# Altium PCB fligt_control_card.PcbDoc (part 1 of 3)
Units mil, origin at the board's own origin, x right, y up, seen from the top; angles counter-clockwise.
Board outline 2510.03 x 2930.03 mil, 4 copper layers (Top Layer, LY_1, LY_2, Bottom Layer), stack 62.677 mil thick; 107 components, 79 nets, 361 pads, 454 vias.
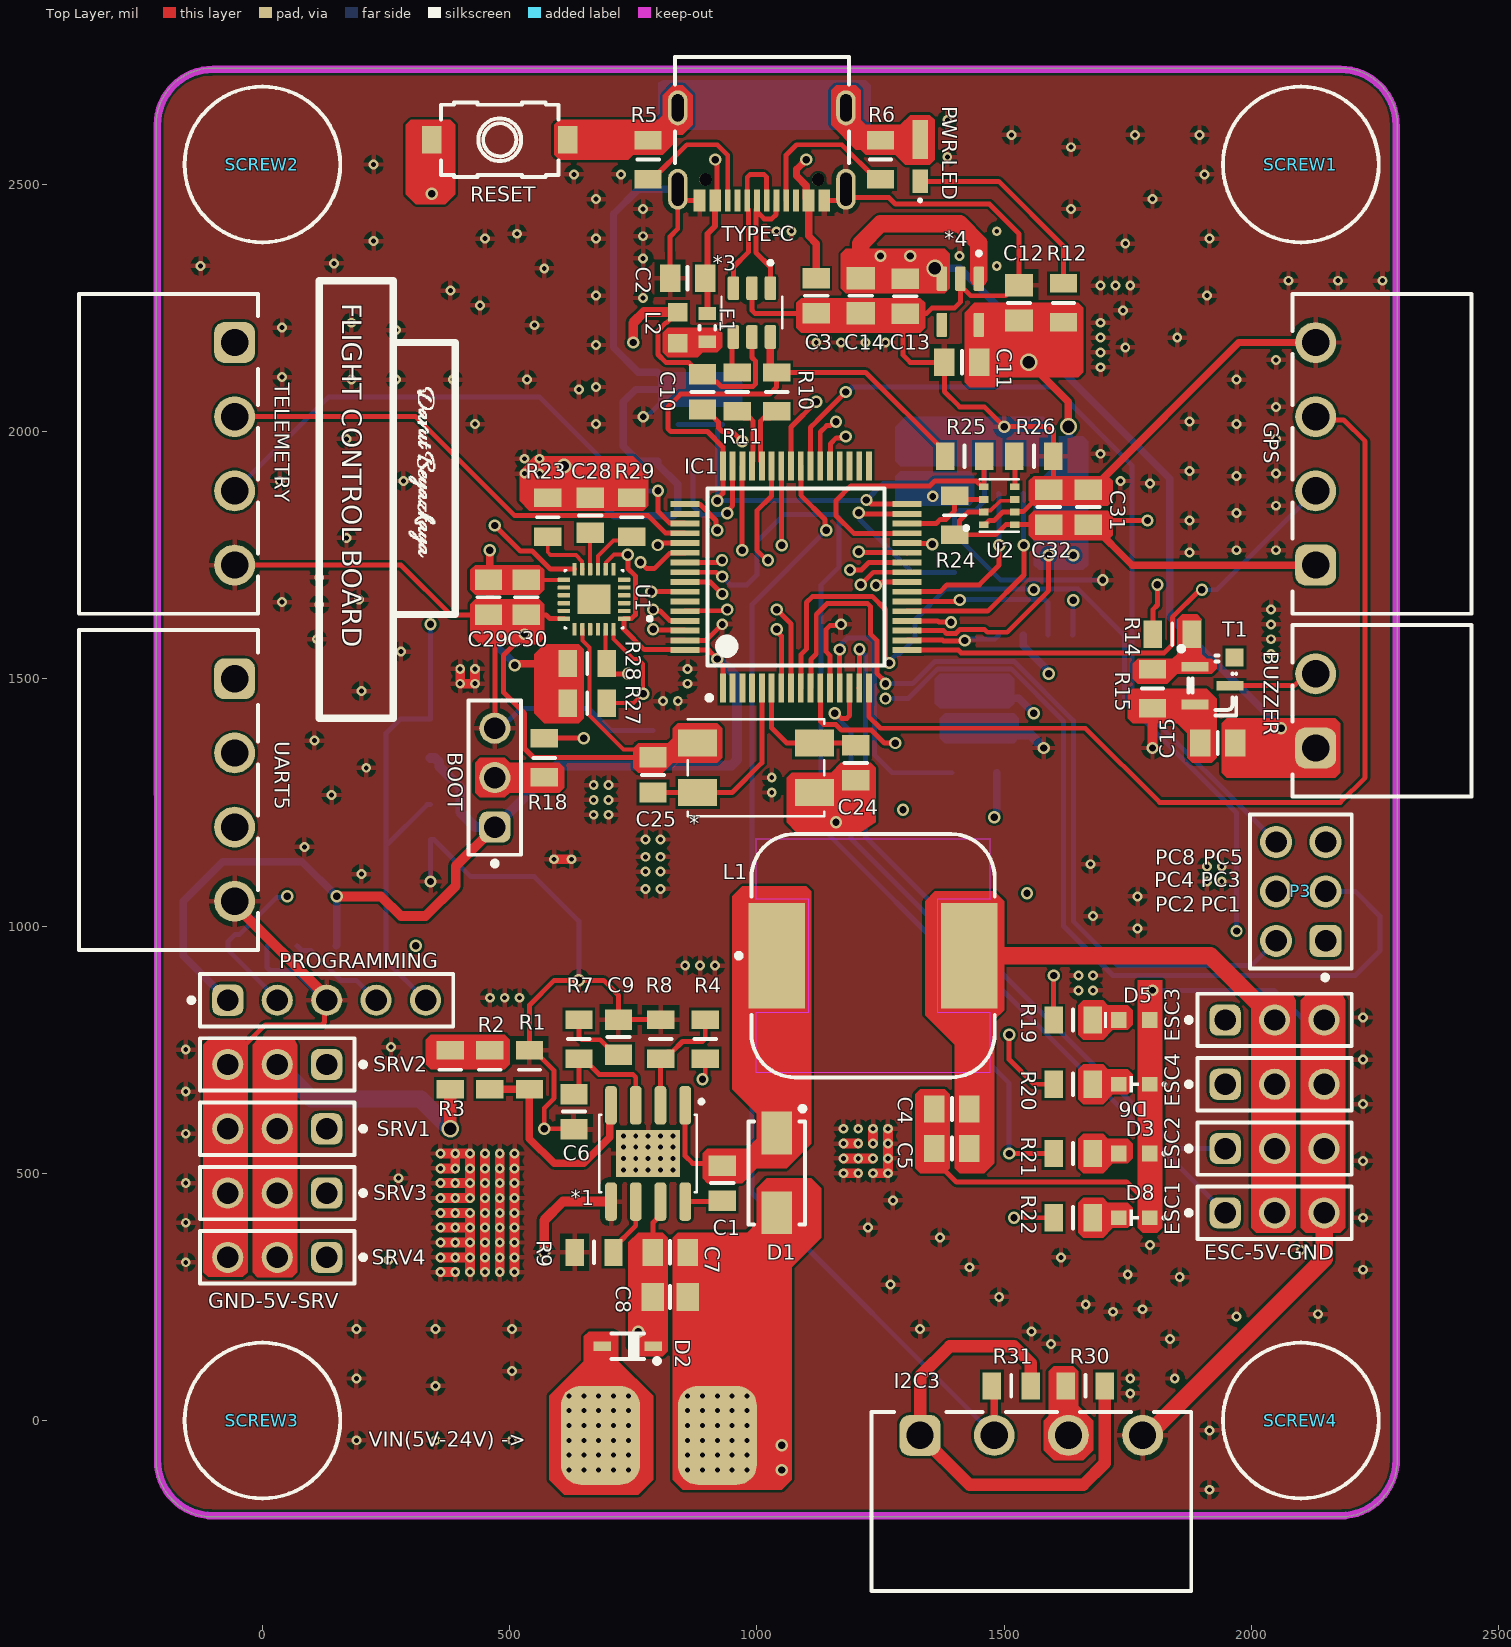
[diagram p0: Top Layer view]
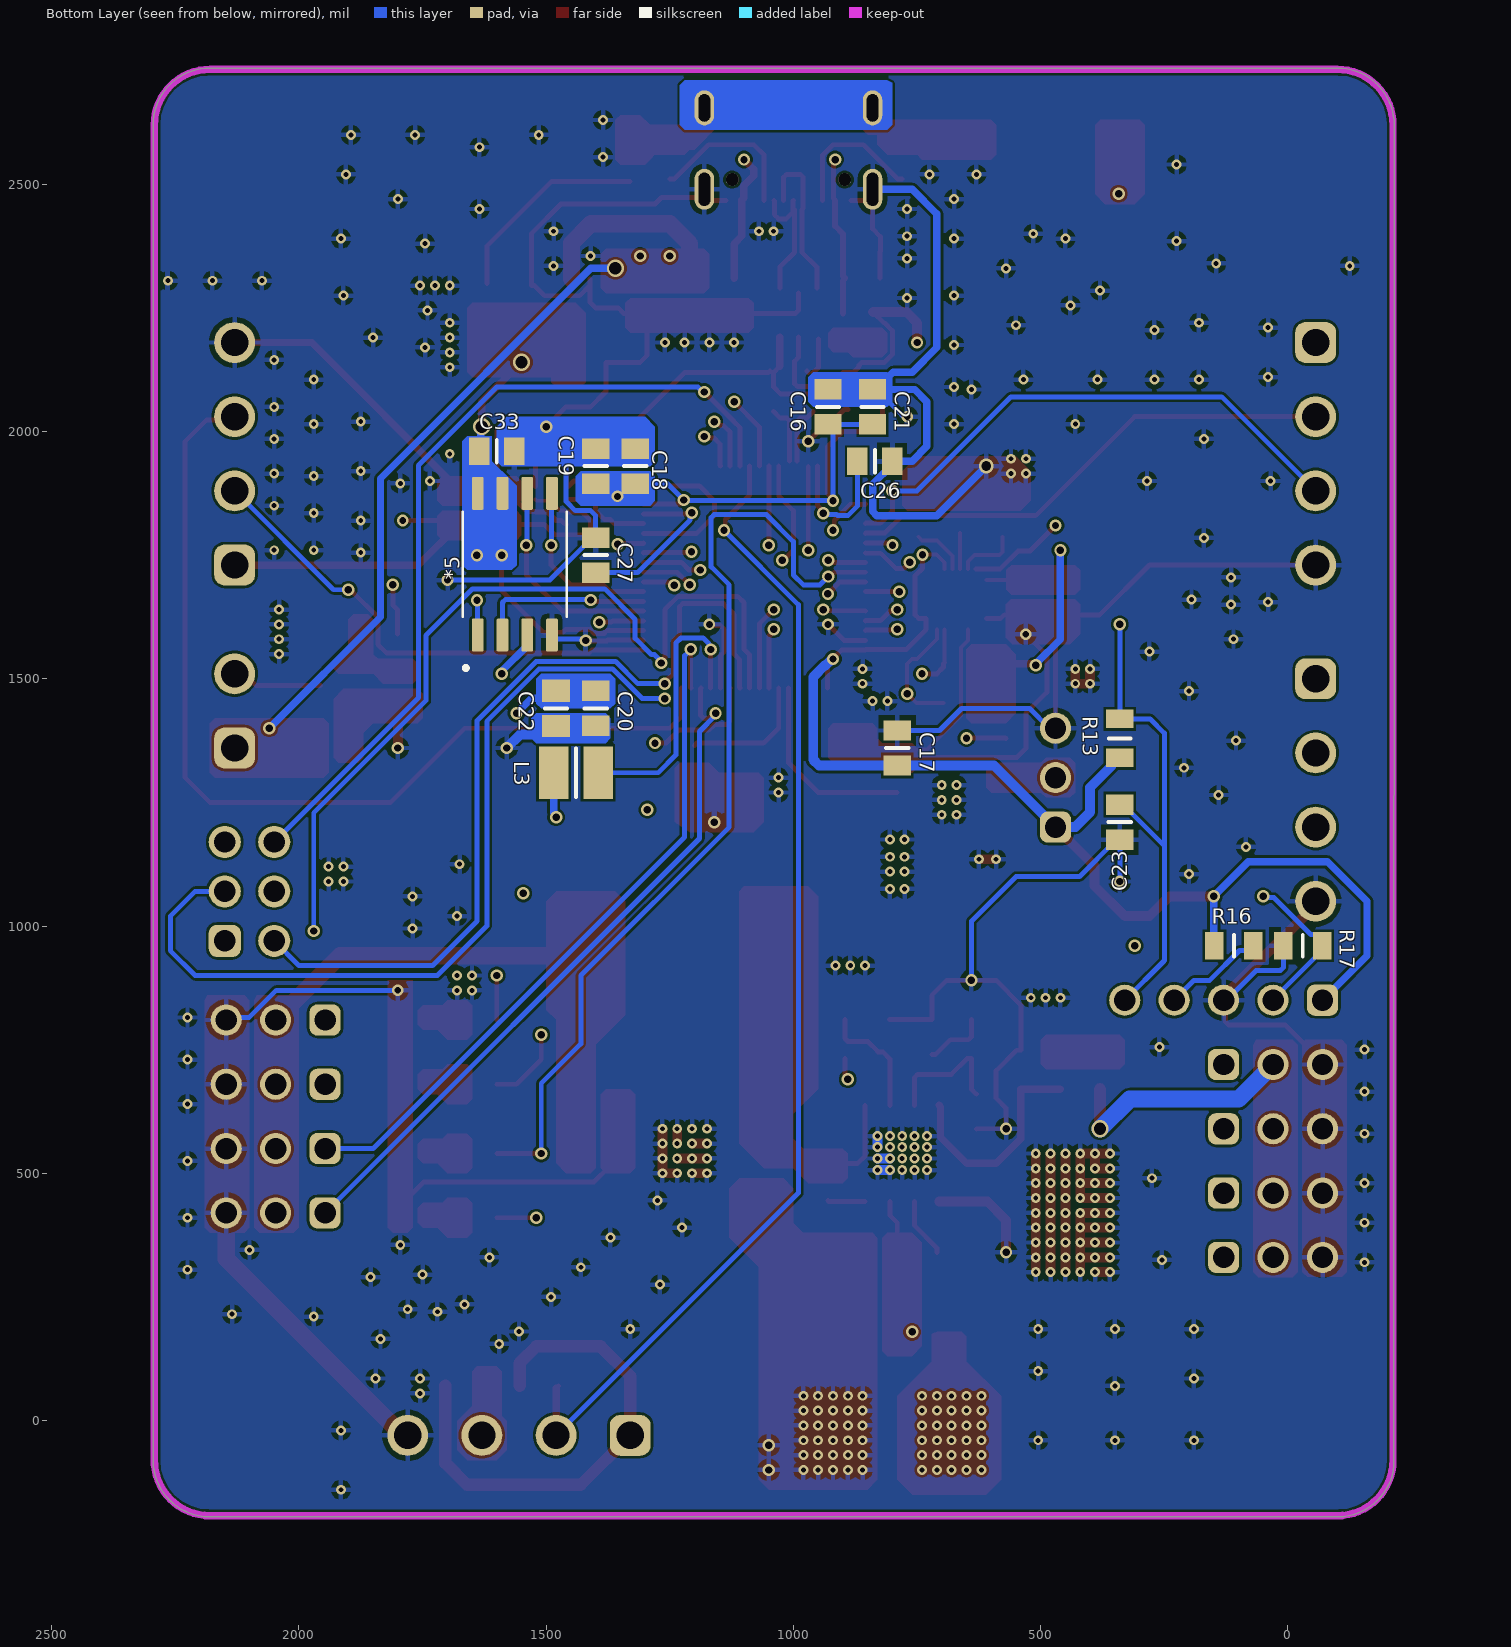
[diagram p1: Bottom Layer view, seen from below]
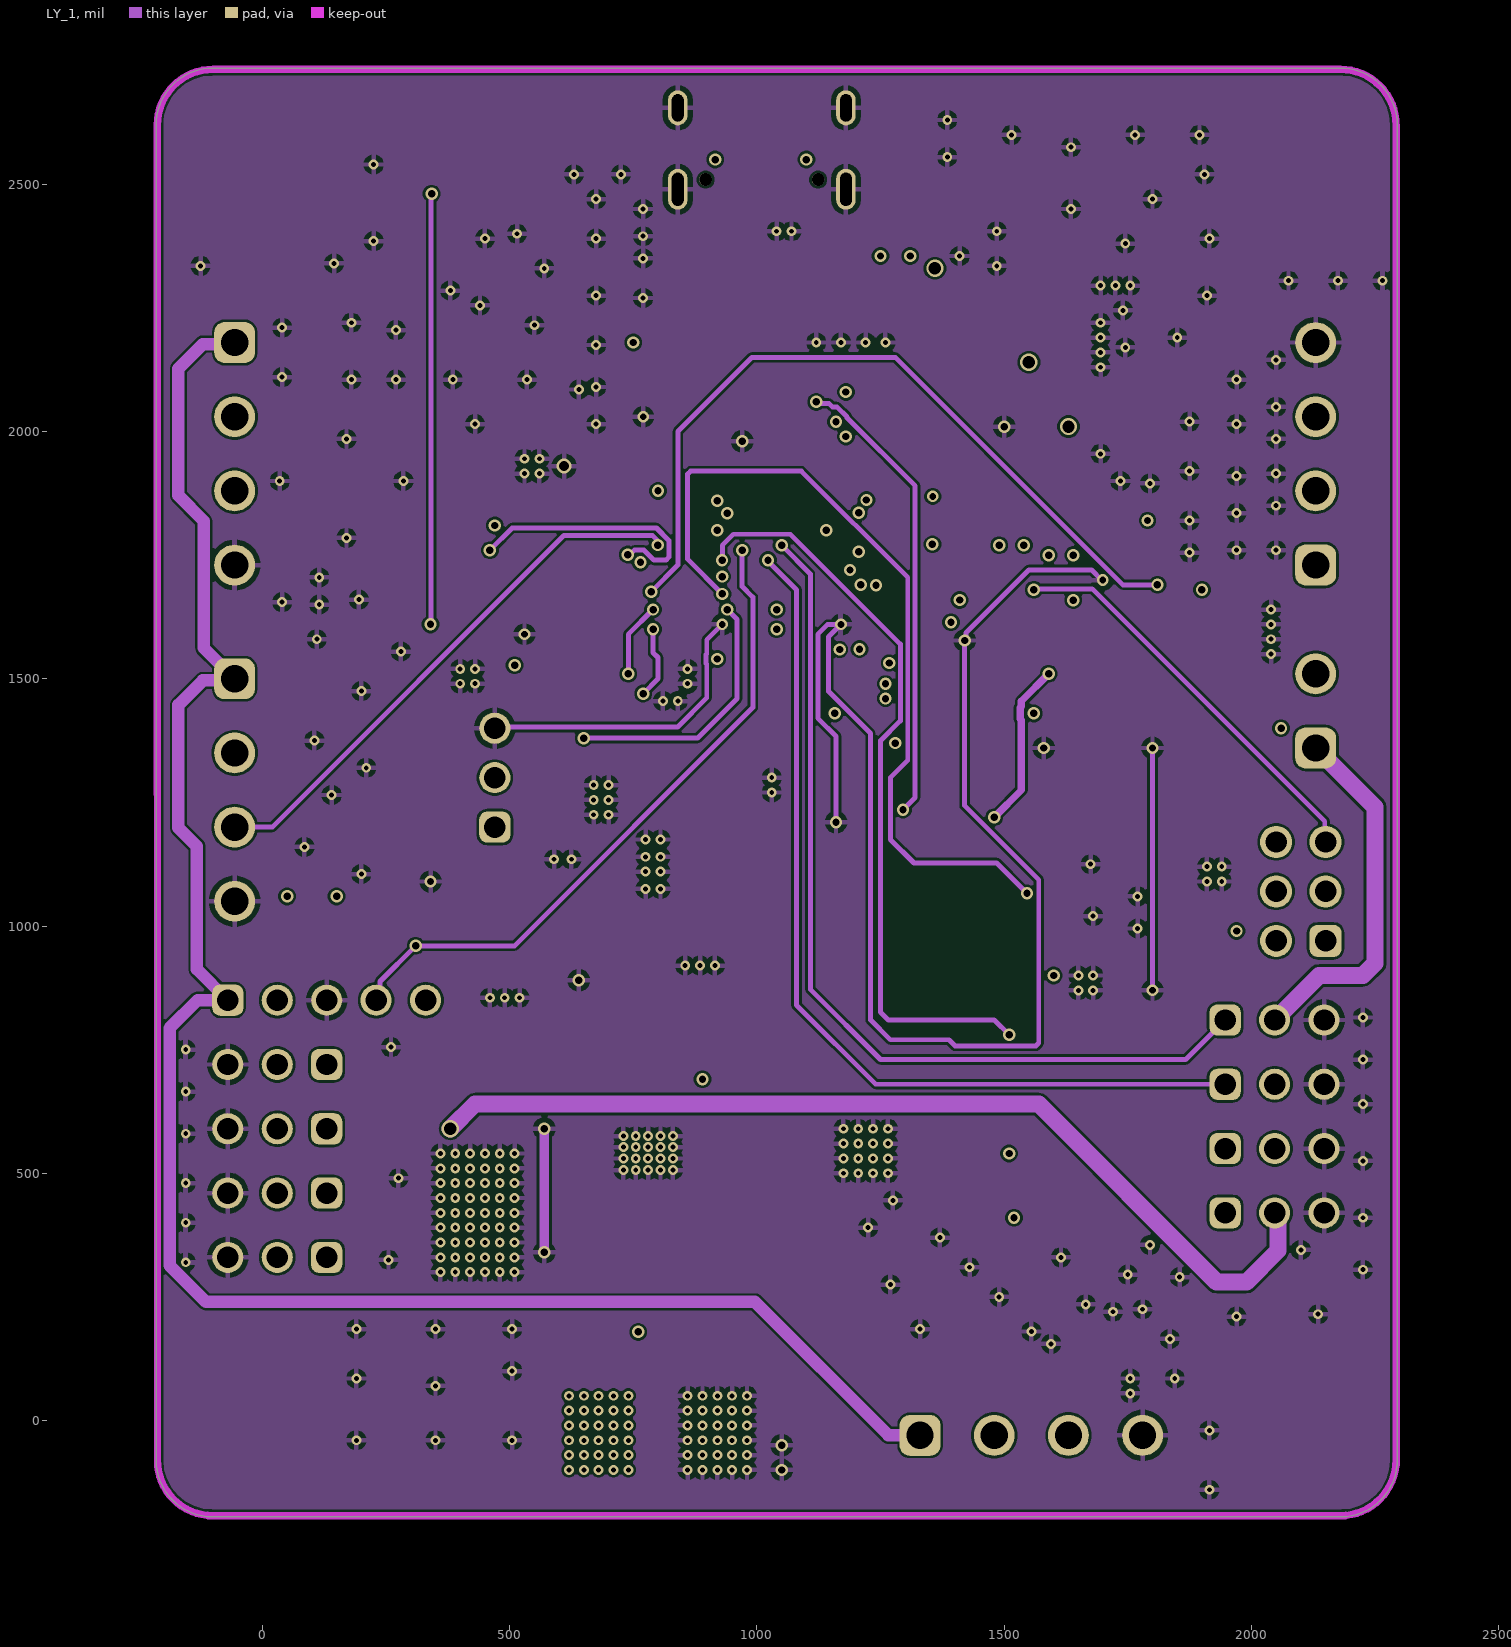
[diagram p2: LY_1]
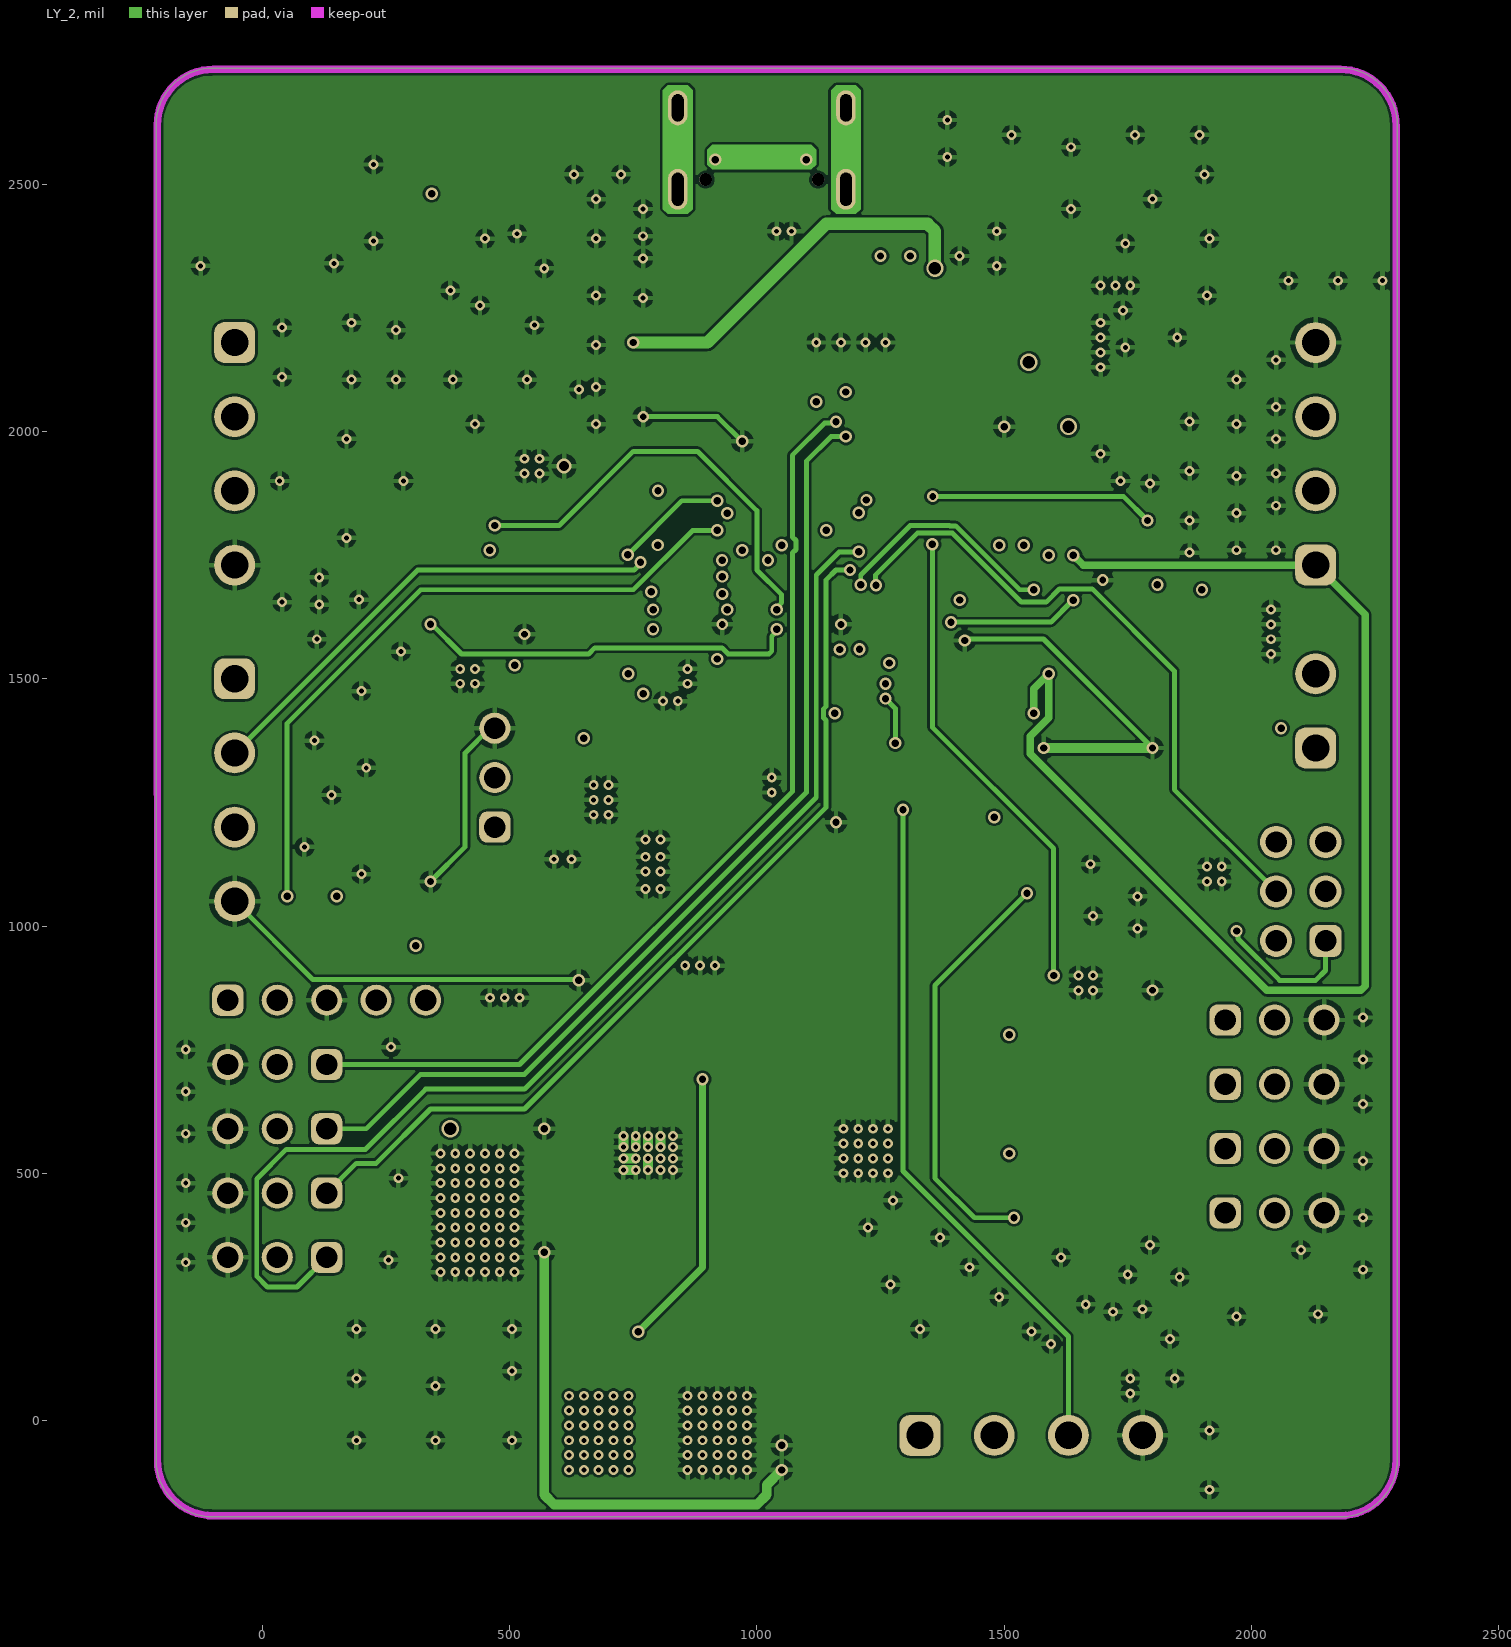
[diagram p3: LY_2]
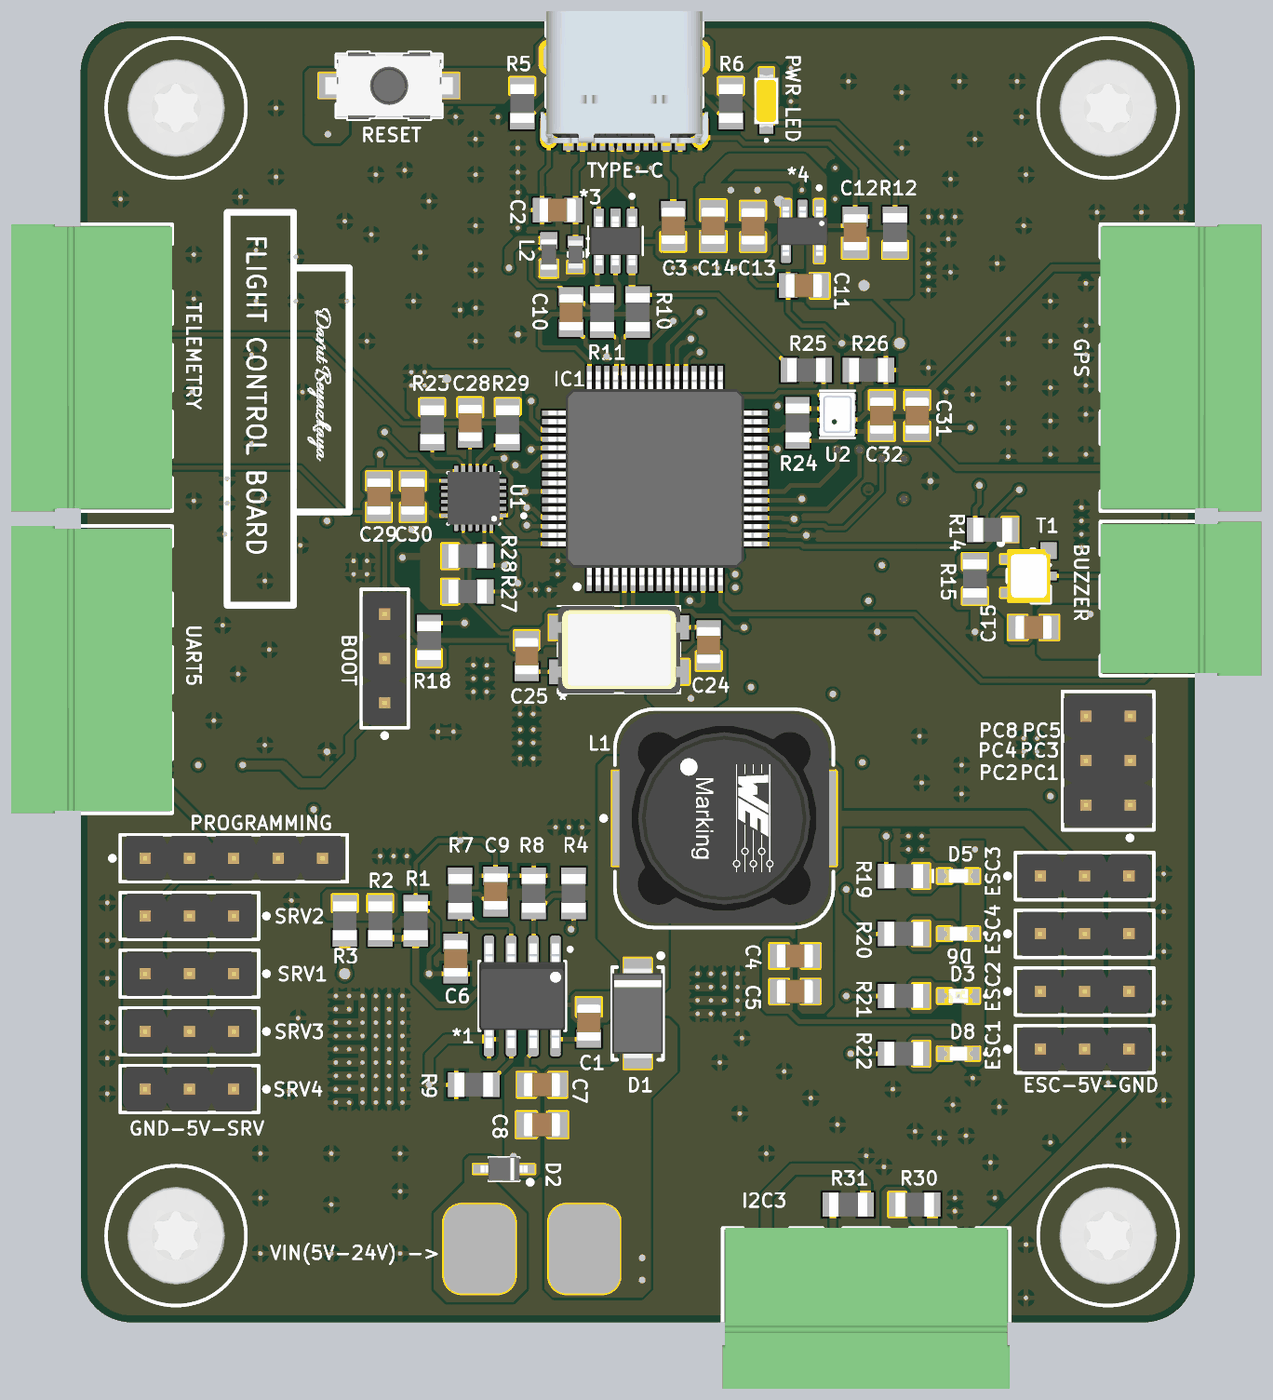
[diagram p5: 3D render of the assembled board from above, using the file's embedded part models]
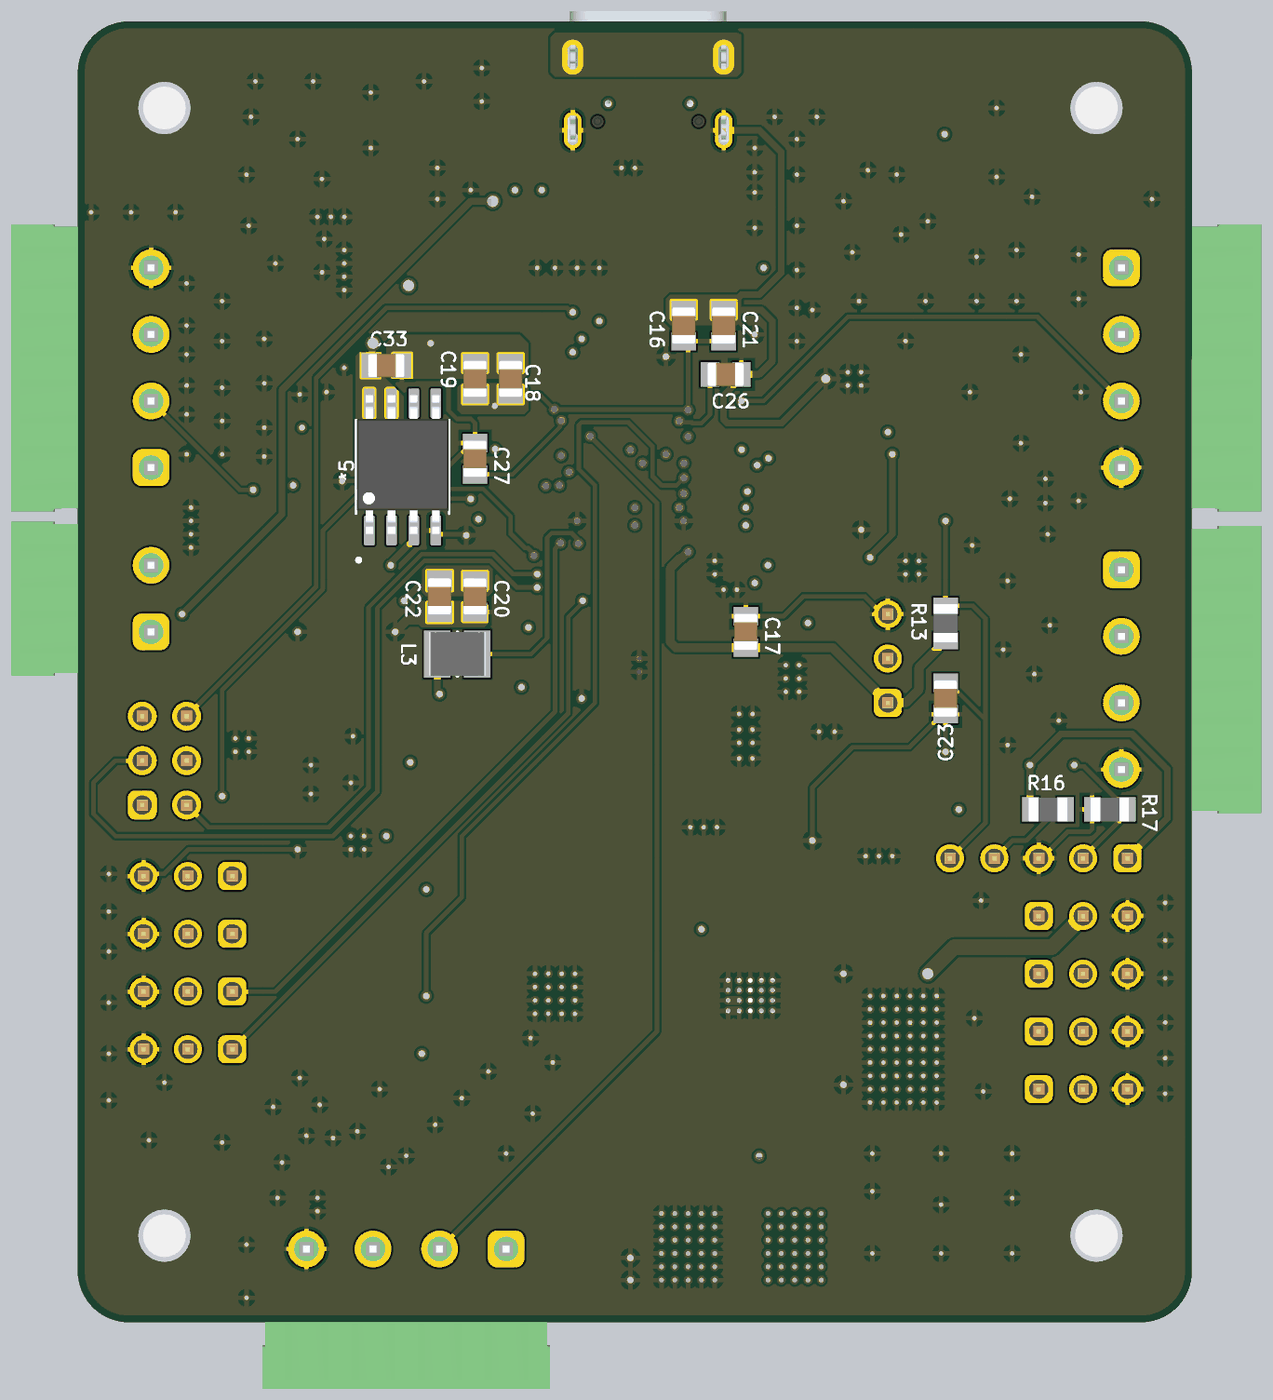
[diagram p6: 3D render of the assembled board from below, using the file's embedded part models]

## Layer stack, top to bottom
Top Solder: solder mask 1, SM-002, Dk 4
Top Layer: signal copper 1.4173
Dielectric 2: prepreg 8.2677, PP-006, Dk 4.1
LY_1: signal copper 0.689
Dielectric 1: dielectric 41.9291, FR-4, Dk 4.8
LY_2: signal copper 0.689
Dielectric 3: prepreg 8.2677, PP-006, Dk 4.1
Bottom Layer: signal copper 1.4173
Bottom Solder: solder mask 1, SM-002, Dk 4

## Board outline
-112.53,-194.33 -110,-195.01 2190,-195.01 2192.53,-194.33 ccw(c2180,-80) 2294.33,-92.53 2295.01,-90 2295.01,2620 ccw(c2180,2620) 2180,2735.01 -100,2735.02 ccw(c-100,2620) -215.02,2620 -214.33,-92.53 ccw(c-100,-80)

## Design rules (kind name [scope] priority, off if disabled: settings)
Clearance Clearance_3 [InNamedPolygon('GND_L01_P003')] p1: gap=5 ignorepadtopadclearanceinfootprint=FALSE
Clearance Clearance_2 [InNamedPolygon('GND_L04_P006')] p2: gap=5 ignorepadtopadclearanceinfootprint=FALSE
Clearance Clearance_1 [InNamedPolygon('GND_L04_P006')] p3: gap=80 ignorepadtopadclearanceinfootprint=FALSE
Clearance [All] p4: gap=5 ignorepadtopadclearanceinfootprint=FALSE
DiffPairsRouting [All] p1: maxlimit=10 minlimit=5 mostfreqgap=5 toplayer_minwidth=10 toplayer_maxwidth=15 toplayer_prefwidth=10 midlayer1_minwidth=10 midlayer1_maxwidth=15 midlayer1_prefwidth=10 midlayer2_minwidth=10 midlayer2_maxwidth=15 midlayer2_prefwidth=10 bottomlayer_minwidth=10 bottomlayer_maxwidth=15 bottomlayer_prefwidth=10 maxuncoupledlength=500
PolygonConnect [All] p1: connectstyle=Relief reliefconductorwidth=10 reliefentries=4 polygonreliefangle="90 Angle" airgapwidth=10
RoutingCorners [All] p1: cornerstyle=45-Degree minsetback=10 maxsetback=100
RoutingVias [All] p1: holewidth=15 width=30 viastyle="Through Hole" minholewidth=10 minwidth=20 maxholewidth=30 maxwidth=100
SolderMaskExpansion [All] p1: expansion=4 istentingtop=FALSE
Width [All] p1: maxlimit=100 minlimit=8 preferedwidth=10 midlayer1_minwidth=10 midlayer2_minwidth=10 minimp=50.000000 maximp=50.000000 favimp=50.000000
28 further rules are at their usual default settings.

## Classes and differential pairs
component class Power: *1 *3 *4 C1 C2 C3 C4 C5 C6 C7 C8 C9 C10 C11 C12 C13 C14 D1 D2 F1 L1 L2 "PWR LED" R1 R2 R3 R4 R5 R6 R7 R8 R9 R10 R11 R12 TYPE-C "VIN(5V-24V) ->"
component class Modules: *5 C28 C29 C30 C31 C32 C33 GPS I2C3 R23 R24 R25 R26 R27 R28 R29 R30 R31 TELEMETRY U1 U2 UART5
component class MCU: * BOOT C15 C16 C17 C18 C19 C20 C21 C22 C23 C24 C25 C26 C27 D3 D5 D6 D8 IC1 L3 P3 R13 R14 R15 R16 R17 R18 R19 R20 R21 R22 SCREW1 SCREW3 SCREW4 T1
differential pair NewDifferentialPair2: +NetR11_2 -NetR10_2
differential pair NewDifferentialPair1: +USB_DP -USB_DN

## Components (designator, comment, footprint, x,y, rotation, side; value= is the part's Value field where it differs from the comment)
* "ECS-80-18-20BQ-DS" ECS-80-18-20BQ-DS 1112.91,1271.74 r180 top
*1 "MP1584EN" MP1584EN 765.59,541.26 r270 top
*3 "USBLC6-2SC6_USB_PROTECTİON" USBLC6-2SC6_USB_PROTECTION 983.27,2243.66 r270 top
*4 "NCP718_reg" NCP718_REG 1420,2260 r270 top
*5 "25LC1024-I/SM_EEPROM" 25LC1024-I/SM_EEPROM 1570,1730 r90 bottom
BOOT "61300311121" 61300311121 470,1300 r90 top (schematic designator P8)
BUZZER "691322310002" 691322310002 2263.86,1435 r90 top (schematic designator P2)
C1 "100nF" CAPC2012X135N 930,480 r90 top
C2 "100nF" CAPC2012X135N 860,2310 r180 top
C3 "100nF" CAPC2012X135N 1120,2274.57 r270 top
C4 "22uF" CAPC2012X135N 1394.33,630 r0 top
C5 "100nF" CAPC2012X135N 1394.33,550 r0 top
C6 "100nF" CAPC2012X135N 630,624.57 r90 top
C7 "100nF" CAPC2012X135N 824.57,340 r0 top
C8 "10uF" CAPC2012X145N 824.57,250 r180 top
C9 "150pF" CAPC2012X135N 720,775.2 r270 top
C10 "100nF" CAPC2012X135N 890,2080 r270 top
C11 "100nF" CAPC2012X135N 1414.57,2140 r0 top
C12 "1uF" CAPC2012X140N 1530,2260 r270 top
C13 "100nF" CAPC2012X135N 1300,2273.58 r90 top
C14 "1uF" CAPC2012X140N 1210,2274.57 r90 top
C15 "100nF" CAPC2012X135N 1931.97,1370 r0 top
C16 "100nF" CAPC2012X135N 930,2050 r270 bottom
C17 "100nF" CAPC2012X135N 790,1360 r270 bottom
C18 "100nF" CAPC2012X135N 1320,1930 r270 bottom
C19 "100nF" CAPC2012X135N 1400,1930 r270 bottom
C20 "100nF" CAPC2012X135N 1400,1440 r90 bottom
C21 "4.7uF" CAPC2012X135N 840,2050 r270 bottom
C22 "1uF" CAPC2012X145N 1480,1440 r90 bottom
C23 "100nF" CAPC2012X135N 340,1210 r90 bottom
C24 "18pF" CAPC2012X135N 1200,1330 r90 top
C25 "18pF" CAPC2012X135N 790,1305.43 r270 top
C26 "2.2uF" CAPC2012X135N 835.43,1940 r0 bottom
C27 "2.2uF" CAPC2012X135N 1400,1750 r270 bottom
C28 "100nF" CAPC2012X135N 662.75,1830.55 r270 top
C29 "100nF" CAPC2012X135N 457.01,1664.76 r90 top
C30 "100nF" CAPC2012X135N 533.38,1664.76 r90 top
C31 "100nF" CAPC2012X135N 1670,1847.05 r270 top
C32 "100nF" CAPC2012X135N 1590,1847.05 r270 top
C33 "100nF" CAPC2012X135N 1600,1960 r0 bottom
D1 "15MQ040NPbF" DIOM5027X244N 1040,500.71 r270 top
D2 "1PS76SB10" SOD2512X110N 738.82,150 r180 top
D3 "Blue, 3.2V, 140°" WL-SMCW_0603_150060xx75020 1762.95,540 r180 top
D5 "Red, 2V, 140°" WL-SMCW_0603_150060xx75003 1762.95,810 r0 top
D6 "Bright Green, 2V, 140°" WL-SMCD_0603 1762.95,680 r180 top
D8 "Yellow, 2V, 140°" WL-SMCD_0603 1762.95,410 r180 top
ESC1 "61300311121" 61300311121 2047.05,420 r0 top (schematic designator P4)
ESC2 "61300311121" 61300311121 2047.05,550 r0 top (schematic designator P6)
ESC3 "61300311121" 61300311121 2047.05,810 r0 top (schematic designator P9)
ESC4 "61300311121" 61300311121 2047.05,680 r0 top (schematic designator P11)
F1 "500mA-50V" FUSC_BOURNS_SF-0603F 900,2210 r270 top
GPS "691322310004" 691322310004 2263.86,1955 r90 top (schematic designator P14)
I2C3 "691322310004" 691322310004 1555,-163.86 r0 top (schematic designator P16)
IC1 "STM32F405RGT6" QFP50P1200X1200X160-64N 1078.9,1705.59 r90 top locked
L1 "15uH, 4.2A" WE-PD_1260 1234.88,940 r270 top locked
L2 "10R@100MHz" INDC1608X95N 840,2210 r90 top
L3 "10uH" IND_MURATA-PS_8200 1440,1310 r180 bottom
P3 "61300621121" 61300621121 2100,1070 r90 top
PROGRAMMING "61300511121" 61300511121 130,850 r0 top (schematic designator P1)
"PWR LED" "Sunrise, 3V, 120°" WL-SWTP_3014_L3W1.4H0.8 1330,2556 r90 top (schematic designator D4)
R1 "40k2" RESC2012X60N 540,709.37 r270 top
R2 "105k" RESC2012X60N 460,709.37 r90 top
R3 "105k" RESC2012X60N 380,709.37 r270 top
R4 "100k" RESC2012X60N 895.59,771.26 r270 top
R5 "5k1" RESC2012X60N 780,2550 r270 top
R6 "5k1" RESC2012X60N 1250,2550 r270 top
R7 "100k" RESC2012X60N 640,771.26 r270 top
R8 "24k9" RESC2012X60N 805.59,771.26 r270 top
R9 "100k" RESC2012X60N 670.63,340 r0 top
R10 "22" RESC2012X60N 1040,2080 r270 top
R11 "22" RESC2012X60N 960,2080 r270 top
R12 "1k" RESC2012X60N 1620,2260 r270 top
R13 "10k" RESC2012X60N 340,1379.37 r270 bottom
R14 "1k" RESC2012X60N 1840,1590 r0 top
R15 "22k" RESC2012X60N 1800,1480 r90 top
R16 "10k" RESC2012X60N 109.37,960 r180 bottom
R17 "10k" RESC2012X60N -30,960 r180 bottom
R18 "10k" RESC2012X60N 570,1340 r90 top value=100k
R19 "1k" RESC2012X60N 1639.37,810 r0 top
R20 "1k" RESC2012X60N 1639.37,680 r0 top
R21 "1k" RESC2012X60N 1639.37,540 r0 top
R22 "1k" RESC2012X60N 1639.37,410 r0 top
R23 "10k" RESC2012X60N 577.01,1826.61 r270 top
R24 "10k" RESC2012X60N 1400,1830.63 r270 top
R25 "10k" RESC2012X60N 1420,1950 r180 top
R26 "10k" RESC2012X60N 1560,1950 r180 top
R27 "10k" RESC2012X60N 657.01,1450.71 r0 top
R28 "10k" RESC2012X60N 657.01,1530.71 r0 top
R29 "10k" RESC2012X60N 747.01,1826.61 r270 top
R30 "10k" RESC2012X60N 1664.37,70 r0 top
R31 "10k" RESC2012X60N 1514.37,70 r0 top
RESET "Push Button" PB_C&K_KSR2xxGLF 480,2590 r0 top (schematic designator PB1)
SCREW1 "M3x6" BOSSARD_BN5687-3061605_v 2100,2540 r0 top
SCREW2 "M3x6" BOSSARD_BN5687-3061605_v 0,2540 r0 top
SCREW3 "M3x6" BOSSARD_BN5687-3061605_v 0,0 r0 top
SCREW4 "M3x6" BOSSARD_BN5687-3061605_v 2100,0 r0 top
SRV1 "61300311121" 61300311121 30,590 r180 top (schematic designator P5)
SRV2 "61300311121" 61300311121 30,720 r180 top (schematic designator P7)
SRV3 "61300311121" 61300311121 30,460 r180 top (schematic designator P10)
SRV4 "61300311121" 61300311121 30,330 r180 top (schematic designator P12)
T1 "2N2222AUB" MICROSEMI_UB 1921.23,1486.07 r270 top
TELEMETRY "691322310004" 691322310004 -190,1955 r270 top (schematic designator P13)
TYPE-C "629722000214" 629722000214 1010,2609.37 r180 top (schematic designator J1)
U1 "MPU-9250" QFN40P300X300X105-25N 670.63,1660.83 r180 top
U2 "BMP280" XDCR_BMP280 1490,1850 r180 top
UART5 "691322310004" 691322310004 -190,1275 r270 top (schematic designator P15)
"VIN(5V-24V) ->" "POWER_CONNECTOR" POWER_CONNECTOR_LION_BATT 683.78,-30 r0 top (schematic designator *2)

## Footprints (in the part's own frame and the unit in brackets; to place one, negate y for a bottom-side part, rotate by r counter-clockwise, add the part's x,y. Pads: shape width x height; smd on the part's side, far side on the other; paste and mask are expansions set on the pad)
25LC1024-I/SM_EEPROM [mm] "-EEPROM / -SOIC 8 kılıfı"
  rrect25% 1.69x0.61 smd: 1(-3.597,1.736) 2(-3.597,0.466) 3(-3.597,-0.804) 4(-3.597,-2.074) 5(3.683,-2.074) 6(3.683,-0.804) 7(3.683,0.466) 8(3.683,1.736)
  silkscreen extent -5.39,-2.83 2.73,2.5, body extent -3.8,-2.8 4.14,2.46, height 2.03
61300311121 [mm] "Pin Header, pitch 2.54 mm, THT, Vertical, single row, 3p"
  rrect50% 1.6x1.6 hole 1.1: 1(-2.54,0)
  round 1.6 hole 1.1: 2(0,0) 3(2.54,0)
  silkscreen extent -4.53,-1.35 3.96,1.35, body extent -3.81,-1.27 3.81,1.27, height 8.57
61300511121 [mm] "Pin Header, pitch 2.54 mm, THT, Vertical, single row, 5p"
  rrect50% 1.6x1.6 hole 1.1: 1(-5.08,0)
  round 1.6 hole 1.1: 2(-2.54,0) 3(0,0) 4(2.54,0) 5(5.08,0)
  silkscreen extent -7.07,-1.35 6.5,1.35, body extent -6.35,-1.27 6.35,1.27, height 8.57
61300621121 [mm] "Pin Header, pitch 2.54 mm, THT, Vertical, dual row, 6p"
  rrect50% 1.65x1.65 hole 1.1: 1(-2.54,-1.27)
  round 1.65 hole 1.1: 2(-2.54,1.27) 3(0,-1.27) 4(0,1.27) 5(2.54,-1.27) 6(2.54,1.27)
  silkscreen extent -4.54,-2.62 3.96,2.62, body extent -3.81,-2.54 3.81,2.54, height 8.59
629722000214 [mm] "USB TYPE C VERTICAL PLUG"
  rect 0.6x1.14 smd: A1/B12(-3.2,3.605) A4/B9(-2.4,3.605) A9/B4(2.4,3.605) A12/B1(3.2,3.605)
  rect 0.3x1.14 smd: A5(-1.25,3.605) A6(-0.25,3.605) A7(0.25,3.605) A8(1.25,3.605) B5(1.75,3.605) B6(0.75,3.605) B7(-0.75,3.605) B8(-1.75,3.605)
  round 0.65 hole 0.65 unplated: MH1(-2.89,2.535) MH2(2.89,2.535)
  oval 1x2.1 hole 0.6 slot 1.7 at 90 deg: Shell(-4.32,3.035) Shell(4.32,3.035)
  oval 1x1.8 hole 0.6 slot 1.4 at 90 deg: Shell(-4.32,-1.145) Shell(4.32,-1.145)
  silkscreen extent -4.47,-3.76 4.47,1.7, body extent -4.79,-3.76 4.79,3.95, height 3.33
691322310002 [mm] "Horizontal PCB Header, pitch 3.81mm, 02p"
  rrect50% 2.1x2.1 hole 1.4: 1(-1.905,3.4)
  round 2.1 hole 1.4: 2(1.905,3.4)
  silkscreen extent -4.4,-4.6 4.41,4.6, body extent -4.4,-4.6 4.41,4.6, height 7.25
691322310004 [mm] "Horizontal PCB Header, pitch 3.81mm, 04p"
  rrect50% 2.1x2.1 hole 1.4: 1(-5.715,3.4)
  round 2.1 hole 1.4: 2(-1.905,3.4) 3(1.905,3.4) 4(5.715,3.4)
  silkscreen extent -8.21,-4.6 8.22,4.6, body extent -8.21,-4.6 8.21,4.6, height 7.25
BOSSARD_BN5687-3061605_v [mil] "M3 L=6mm Hexalobular Socket Pan Head Screw, Fully Threaded - Stainless Steel A2"
  silkscreen extent -157,-157 157,157, body extent -110,-110 110,110, height 94
CAPC2012X135N [mm] "Chip Capacitor, Body 2.0x1.25mm, IPC Medium Density"
  rect 1.05x1.4 smd: 1(-0.9,0) 2(0.9,0)
  silkscreen extent 0,-0.58 0,0.58, body extent -1.05,-0.67 1.05,0.68, height 1.25
CAPC2012X140N [mm] "Chip Capacitor, Body 2.0x1.25mm, IPC Medium Density"
  rect 1.15x1.45 smd: 1(-0.9,0) 2(0.9,0)
  silkscreen extent 0,-0.58 0,0.58, body extent -1.05,-0.67 1.05,0.68, height 1.3
CAPC2012X145N [mm] "Chip Capacitor, Body 2.0x1.45mm, IPC Medium Density"
  rect 1.15x1.45 smd: 1(-0.9,0) 2(0.9,0)
  silkscreen extent 0,-0.58 0,0.58, body extent -1.05,-0.67 1.05,0.68, height 1.45
DIOM5027X244N [mm] "DO-214-AC/SMA  Molded Diode, Body 5.0x2.7mm, IPC Medium Density"
  rect 2.2x1.55 smd: 1(-2.05,0) 2(2.05,0)
  silkscreen extent -3.42,-1.45 2.65,1.45, body extent -2.6,-1.45 2.6,1.45, height 2.44
ECS-80-18-20BQ-DS [mm] "Ürün Özellikleri:    / Mounting Type: SMT      / Height: 1.30mm   / Resistance (ESR): 60 Ohms  / Length: 7.00mm   / Manufacturer: ECS      / Capacitance: 18pF     / Frequency Stability: ±100PPM  / Width: 5.00mm   / Series:  CSM-8Q   / Operating Temperature : -40°C~+125°C     / Packaging : TAPE&REEL        / Package / Case : 4-SMD    / Frequency: 8MHz     / Frequency Tolerance :±30PPM   / Applications: Automotive(AEC-Q200)     / Rohs :ROHS"
  rect 2x1.4 smd: 1(-0.084,-2.496) 2(5.916,-2.496) 3(5.916,0.044) 4(-0.084,0.044)
  silkscreen extent -0.58,-3.73 6.42,1.27, body extent -0.58,-3.73 6.42,1.27, height 1.3
FUSC_BOURNS_SF-0603F [mm] "0603 (1608mm), Body 1.6 x 0.8mm, Fast Acting Thin Film Chip Fuse, SinglFuse SF-0603F Series"
  rect 0.65x0.9 smd: 1(-0.725,0) 2(0.725,0)
  silkscreen extent -0.1,-0.4 0.1,0.4, body extent -0.8,-0.4 0.8,0.4, height 0.55
IND_MURATA-PS_8200 [mm] "Miniature Surface Mount Power Inductors, 3.2mm L X 2.5mm W X 2.3mm H, MURATA 8200 Series"
  rect 1.52x2.7 smd: 1(-1.145,0) 2(1.145,0)
  silkscreen extent 0,-1.25 0,1.25, body extent -1.6,-1.25 1.6,1.25, height 2.3
INDC1608X95N [mm] "Chip Inductor, 2-Leads, EIA 0603, Metric 1608, Body 1.6x0.8mm, IPC Medium Density"
  rect 0.95x1 smd: 1(-0.8,0) 2(0.8,0)
  body extent -0.87,-0.47 0.88,0.48, height 0.95
MICROSEMI_UB [mm] "MICROSEMI UB Case, 2.45mm L x 3.08mm W 1.42mm H body"
  rect 0.5x1.4 smd: 1(-0.965,-0.9) 2(0.965,-0.9) 3(0,0.9)
  rect 0.935x0.935 smd: 4(-1.448,1.132)
  silkscreen extent -2.02,-1.72 1.54,1.22, body extent -1.54,-1.22 1.54,1.23, height 1.42
MP1584EN [mm]
  rrect54% 1.97x0.6 smd: 1(-2.443,2.271) 2(-2.443,1.001) 3(-2.443,-0.269) 4(-2.443,-1.539) 5(2.507,-1.539) 6(2.507,-0.269) 7(2.507,1.001) 8(2.507,2.271)
  rect 2.41x3.3 smd paste-3: 9(0.032,0.366)
  silkscreen extent -2.73,-2.13 2.03,3.21, body extent -2.97,-2.09 3.03,2.82, height 1.7
NCP718_REG [mm]
  rrect25% 1.24x0.55 smd: 1(-1.245,0.734) 2(-1.245,-0.216) 3(-1.245,-1.166) 4(1.125,-1.166) 5(1.125,0.734)
  silkscreen extent -2.64,0.63 -2.45,0.83, body extent -1.46,-1.67 1.34,1.23, height 1
PB_C&K_KSR2xxGLF [mm] "Body 7.3x3.8mm, Surface Mount Subminiature Tact Switch, C&K KSR Series"
  rect 1x1.4 smd: 1(-3.5,0) 2(3.5,0)
  silkscreen extent -3.02,-1.92 3.02,1.92, body extent -3.65,-1.92 3.65,1.92, height 2.5
POWER_CONNECTOR_LION_BATT [mil]
  rrect50% 160x200 smd: 1(0,0) 2(236.22,0)
QFN40P300X300X105-25N [mm]
  rrect25% 0.64x0.22 smd: 1(-1.545,1) 2(-1.545,0.6) 3(-1.545,0.2) 4(-1.545,-0.2) 5(-1.545,-0.6) 6(-1.545,-1) 13(1.545,-1) 14(1.545,-0.6) 15(1.545,-0.2) 16(1.545,0.2) 17(1.545,0.6) 18(1.545,1)
  rrect25% 0.22x0.64 smd: 7(-1,-1.545) 8(-0.6,-1.545) 9(-0.2,-1.545) 10(0.2,-1.545) 11(0.6,-1.545) 12(1,-1.545) 19(1,1.545) 20(0.6,1.545) 21(0.2,1.545) 22(-0.2,1.545) 23(-0.6,1.545) 24(-1,1.545)
  rect 1.7x1.54 smd paste-2: 25(0,0)
  silkscreen extent -2.97,-1.5 1.5,1.5, body extent -1.5,-1.5 1.5,1.5, height 1.05
QFP50P1200X1200X160-64N [mm] "QFP, 0.50mm Pitch, Square; 16 Pin X 16 Pin, 10.00mm X 10.00mm X 1.60mm Body, IPC Medium Density"
  rect 1.5x0.3 smd: 1(-5.7,3.75) 2(-5.7,3.25) 3(-5.7,2.75) 4(-5.7,2.25) 5(-5.7,1.75) 6(-5.7,1.25) 7(-5.7,0.75) 8(-5.7,0.25) 9(-5.7,-0.25) 10(-5.7,-0.75) 11(-5.7,-1.25) 12(-5.7,-1.75) 13(-5.7,-2.25) 14(-5.7,-2.75) 15(-5.7,-3.25) 16(-5.7,-3.75) 33(5.7,-3.75) 34(5.7,-3.25) 35(5.7,-2.75) 36(5.7,-2.25) 37(5.7,-1.75) 38(5.7,-1.25) 39(5.7,-0.75) 40(5.7,-0.25) 41(5.7,0.25) 42(5.7,0.75) 43(5.7,1.25) 44(5.7,1.75) 45(5.7,2.25) 46(5.7,2.75) 47(5.7,3.25) 48(5.7,3.75)
  rect 0.3x1.5 smd: 17(-3.75,-5.7) 18(-3.25,-5.7) 19(-2.75,-5.7) 20(-2.25,-5.7) 21(-1.75,-5.7) 22(-1.25,-5.7) 23(-0.75,-5.7) 24(-0.25,-5.7) 25(0.25,-5.7) 26(0.75,-5.7) 27(1.25,-5.7) 28(1.75,-5.7) 29(2.25,-5.7) 30(2.75,-5.7) 31(3.25,-5.7) 32(3.75,-5.7) 49(3.75,5.7) 50(3.25,5.7) 51(2.75,5.7) 52(2.25,5.7) 53(1.75,5.7) 54(1.25,5.7) 55(0.75,5.7) 56(0.25,5.7) 57(-0.25,5.7) 58(-0.75,5.7) 59(-1.25,5.7) 60(-1.75,5.7) 61(-2.25,5.7) 62(-2.75,5.7) 63(-3.25,5.7) 64(-3.75,5.7)
  silkscreen extent -6.32,-4.55 4.55,4.57, body extent -6.1,-6.1 6.1,6.1, height 1.6
RESC2012X60N [mm] "Chip Resistor, EIA 0805, Metric 2012, Body 2.0x1.2mm, IPC Medium Density"
  rect 0.95x1.4 smd: 1(-1,0) 2(1,0)
  silkscreen extent 0,-0.55 0,0.55, body extent -1.1,-0.67 1.1,0.68, height 0.6
SOD2512X110N [mm] "Small Outline Diode (SOD-323), 1.70mm W X 1.25mm L X 1.10mm H body,  IPC Medium Density"
  rect 0.9x0.5 smd: 1(-1.3,0) 2(1.3,0)
  silkscreen extent -1.63,-0.65 0.85,0.87, body extent -1.35,-0.67 1.35,0.68, height 1.1
USBLC6-2SC6_USB_PROTECTION [mm]
  rrect25% 1.21x0.59 smd: 1(-1.177,1.121) 2(-1.177,0.171) 3(-1.177,-0.779) 4(1.333,-0.779) 5(1.333,0.171) 6(1.333,1.121)
  silkscreen extent -2.58,-1.39 0.89,1.74, body extent -1.32,-1.29 1.48,1.63, height 1.45
WE-PD_1260 [mm] "SMT Shielded Power Inductor, 2-leads, body 12x12mm"
  rect 5.4x2.9 smd: 1(0,-4.95) 2(0,4.95)
  Top Layer keep-out region: -6,6 -2.9,6 -2.9,3.3 2.9,3.3 2.9,6 6,6 6,-6 2.9,-6 2.9,-3.3 -2.9,-3.3 -2.9,-6 -6,-6
  silkscreen extent -6.25,-7.02 6.25,6.25, body extent -6,-6 6,6, height 5.66
WL-SMCD_0603 [mm] "SMD Mono-color Chip LED, body 1.6x0.8mm"
  rect 0.8x0.75 smd: 1(-0.8,0) 2(0.8,0)
  silkscreen extent -1.63,-0.4 0.22,0.4, body extent -0.8,-0.4 0.8,0.4, height 0.42
WL-SMCW_0603_150060xx75003 [mm] "SMD Mono-color Chip LED, body 1.6x0.8mm"
  rect 0.8x0.8 smd: 1(-0.8,0) 2(0.8,0)
  silkscreen extent -1.55,-0.4 -1.4,0.4, body extent -0.8,-0.4 0.8,0.4, height 0.7
WL-SMCW_0603_150060xx75020 [mm] "SMD Mono-color Chip LED, body 1.6x0.8mm"
  rect 0.8x0.8 smd: 1(-0.8,0) 2(0.8,0)
  silkscreen extent -1.63,-0.07 -1.48,0.07, body extent -0.8,-0.4 0.8,0.4, height 0.25
WL-SWTP_3014_L3W1.4H0.8 [mm] "SMD White Top view PLCC, body 3x1.4mm"
  rect 2x0.8 smd: 1(0.88,0)
  rect 1.2x0.8 smd: 2(-1.27,0)
  silkscreen extent -2.32,-0.08 -2.18,0.07, body extent -1.5,-0.7 1.5,0.7, height 0.8
XDCR_BMP280 [mm]
  rect 0.5x0.35 smd: 1(0.8,0.975) 2(0.8,0.325) 3(0.8,-0.325) 4(0.8,-0.975) 5(-0.8,-0.975) 6(-0.8,-0.325) 7(-0.8,0.325) 8(-0.8,0.975)
  silkscreen extent -1,-1.35 1.79,1.35, body extent -1,-1.25 1,1.25, height 1

## Part data
BOOT ESC1 ESC2 ESC3 ESC4 SRV1 SRV2 SRV3 SRV4: "WR-PHD Pin Header, THT, Vertical, pitch 2.54mm, 1 Row, 3P", Contact Resistance=20mOhm, Manufacturer="Wurth Elektronik", Operating Temperature Max=105°C, Operating Temperature Min=-40°C, Rated Current=3A, Withstanding Voltage=500V, Working Voltage=250V, Category="Board-to-Board Connectors", ComponentLink1Description="Website Link", ComponentLink1URL=https://www.we-online.com/redexpert/article/61300311121?ad, ComponentLink2Description="Datasheet Link", ComponentLink2URL=https://www.we-online.com/redexpert/spec/61300311121?ad, Gender="Pin Header", Manufacturer Part Number=61300311121, Match Code=WR-PHD, Mount="Through Hole", Number of Pins=3, Number of Rows=1, Orientation=Vertical, Packaging=Bag, Pitch=2.54mm
BUZZER: "WR-TBL Series 322 Horizontal PCB Header, THT, pitch 3.81mm, 2p", Manufacturer="Wurth Elektronik", Operating Temperature Max=105°C, Operating Temperature Min=-40°C, Rated Current=10A, Working Voltage=300V, Application=Pluggable, Category="Terminal Blocks", ComponentLink1Description="Website Link", ComponentLink1URL=https://www.we-online.com/redexpert/article/691322310002?ad, ComponentLink2Description="Datasheet Link", ComponentLink2URL=https://www.we-online.com/redexpert/spec/691322310002?ad, Manufacturer Part Number=691322310002, Match Code=WR-TBL, Modularity=No, Mount="Through Hole", Number of Pins=2, Number of Rows=1, Orientation=Horizontal, Packaging=Box, Pitch=3.81mm
C1 C2 C3 C5 C6 C7 C10 C11 C13 C15 C16 C17 C18 C19 C20 C23 C28 C29 C30 C31 C32 C33: library part CC0805_100NF_50V_10%_X7R, "Non-polarised capacitor", Case=0805, Manufacturer=GENERIC, Manufacturer1 ComponentHeight=1mm, Manufacturer1 Example=TDK, Manufacturer1 Part Number=C2012X7R1H104K085, Tolerance=±10%, Voltage=50V, Author="CERN DEM JLC", Component Type=Standard, CreateDate=3.12.2007, HelpURL=\\cern.ch\dfs\Applications\Altium\Datasheets\CC0805_X7R_TDK_C.pdf, LatestRevisionDate=22.04.2015, Manufacturer Part Number=CC0805_100NF_50V_10%_X7R, Mounted=Yes, Part Description="SMD Multilayer Chip Ceramic Capacitor", Part Number=CC0805_100NF_50V_10%_X7R, Pin Count=2, Sense=No, SMD=Yes, Socket=No, Status=None, TC=X7R
C4: library part CC0805_22UF_16V_10%_X5R, "Non-polarised capacitor", Case=0805, Manufacturer=GENERIC, Manufacturer1 ComponentHeight=1.35mm, Manufacturer1 Example=TDK, Manufacturer1 Part Number=C2012X5R1C226KT, Tolerance=±10%, Voltage=16V, Author="CERN DEM JLC", Component Type=Standard, CreateDate=25.10.2012, HelpURL=\\cern.ch\dfs\Applications\Altium\Datasheets\CC0805_X5R_TDK_C.pdf, LatestRevisionDate=25.10.2012, Manufacturer Part Number=CC0805_22UF_16V_10%_X5R, Mounted=Yes, Part Description="SMD Multilayer Chip Ceramic Capacitor", Part Number=CC0805_22UF_16V_10%_X5R, Pin Count=2, Sense=No, SMD=Yes, Socket=No, Status=Preferred, TC=X5R
C8: library part CC0805_10UF_25V_10%_X5R_YUDEN_TMK212BBJ106KGHT, "Non-polarised capacitor", Case=0805, Manufacturer="TAIYO YUDEN", Manufacturer Part Number=TMK212BBJ106KGHT, Tolerance=±10%, Voltage=25V, Author="CERN DEM JLC", Component Type=Standard, ComponentHeight=1.45mm, CreateDate=23.01.2018, HelpURL=\\cern.ch\dfs\Applications\Altium\Datasheets\CC0805_TAIYO-YUDEN_TMK212BBJ106KGHT.pdf, LatestRevisionDate=23.01.2018, Mounted=Yes, Part Description="SMD Multilayer Chip Ceramic Capacitor (High Dielectric Type) for Automotive / Industrial Applications", Part Number=CC0805_10UF_25V_10%_X5R_YUDEN_TMK212BBJ106KGHT, Pin Count=2, Sense=No, SMD=Yes, Socket=No, Status="Not Recommended", TC=X5R
C9: library part CC0805_150PF_50V_5%_C0G, "Non-polarised capacitor", Case=0805, Manufacturer=GENERIC, Manufacturer1 ComponentHeight=0.88mm, Manufacturer1 Example=KEMET, Manufacturer1 Part Number=C0805C151J5GACTU, Tolerance=±5%, Voltage=50V, Author="CERN DEM JLC", Component Type=Standard, CreateDate=3.12.2007, HelpURL="\\cern.ch\dfs\Applications\Altium\Datasheets\CC0805_C0G_KEMET_(Commercial Grade).pdf", LatestRevisionDate=22.04.2015, Manufacturer Part Number=CC0805_150PF_50V_5%_C0G, Mounted=Yes, Part Description="SMD Multilayer Chip Ceramic Capacitor", Part Number=CC0805_150PF_50V_5%_C0G, Pin Count=2, Sense=No, SMD=Yes, Socket=No, Status=Preferred, TC=C0G/NP0
C12 C14: library part CC0805_1UF_35V_20%_X7R, "Non-polarised capacitor", Case=0805, Manufacturer=GENERIC, Manufacturer1 ComponentHeight=1.35mm, Manufacturer1 Example="TAIYO YUDEN", Manufacturer1 Part Number=GMK212B7105MG-T, Tolerance=±20%, Voltage=35V, Author="CERN DEM JLC", Component Type=Standard, CreateDate=22.06.2011, HelpURL=\\cern.ch\dfs\Applications\Altium\Datasheets\CC0805_X7R_TAIYO-YUDEN_HIGH-VALUE.pdf, LatestRevisionDate=22.06.2011, Manufacturer Part Number=CC0805_1UF_35V_20%_X7R, Mounted=Yes, Part Description="SMD Multilayer Chip Ceramic Capacitor", Part Number=CC0805_1UF_35V_20%_X7R, Pin Count=2, Sense=No, SMD=Yes, Socket=No, Status="Not Recommended", TC=X7R
C21: library part CC0805_4.7UF_10V_10%_X5R, "Non-polarised capacitor", Case=0805, Manufacturer=GENERIC, Manufacturer1 ComponentHeight=1.45mm, Manufacturer1 Example=PHYCOMP, Manufacturer1 Part Number=222224013672, Tolerance=±10%, Voltage=10V, Author="CERN DEM JLC", Component Type=Standard, CreateDate=3.12.2007, HelpURL=\\cern.ch\dfs\Applications\Altium\Datasheets\CC0805_X5R_PHYCOMP_HC.pdf, LatestRevisionDate=3.12.2007, Manufacturer Part Number=CC0805_4.7UF_10V_10%_X5R, Mounted=Yes, Part Description="SMD Multilayer Chip Ceramic Capacitor", Part Number=CC0805_4.7UF_10V_10%_X5R, Pin Count=2, Sense=No, SMD=Yes, Socket=No, Status=Preferred, TC=X5R
C22: library part CC0805_1UF_100V_10%_X7S_YUDEN_HMK212BC7105KGHTE, "Non-polarised capacitor", Case=0805, Manufacturer="TAIYO YUDEN", Manufacturer Part Number=HMK212BC7105KGHTE, Tolerance=±10%, Voltage=100V, Author="CERN DEM JLC", Component Type=Standard, ComponentHeight=1.45mm, CreateDate=9.05.2017, HelpURL=\\cern.ch\dfs\Applications\Altium\Datasheets\CC0805_TAIYO-YUDEN_HMK212BC7105KGHTE.pdf, LatestRevisionDate=9.05.2017, Mounted=Yes, Part Description="SMD Multilayer Chip Ceramic Capacitor for Automotive / Industrial Applications", Part Number=CC0805_1UF_100V_10%_X7S_YUDEN_HMK212BC7105KGHTE, Pin Count=2, Sense=No, SMD=Yes, Socket=No, Status="Not Recommended", TC=X7S
C24 C25: library part CC0805_18PF_50V_5%_NP0, "Non-polarised capacitor", Case=0805, Manufacturer=GENERIC, Manufacturer1 ComponentHeight=1.35mm, Manufacturer1 Example=PHYCOMP, Manufacturer1 Part Number=223886115189, Tolerance=±5%, Voltage=50V, Author="CERN DEM JLC", Component Type=Standard, CreateDate=3.12.2007, HelpURL=\\cern.ch\dfs\Applications\Altium\Datasheets\CC0805_NP0_PHYCOMP.pdf, LatestRevisionDate=3.12.2007, Manufacturer Part Number=CC0805_18PF_50V_5%_NP0, Mounted=Yes, Part Description="SMD Multilayer Chip Ceramic Capacitor", Part Number=CC0805_18PF_50V_5%_NP0, Pin Count=2, Sense=No, SMD=Yes, Socket=No, Status=Preferred, TC=C0G/NP0
C26 C27: library part CC0805_2.2UF_16V_10%_X7R, "Non-polarised capacitor", Case=0805, Manufacturer=GENERIC, Manufacturer1 ComponentHeight=1.5mm, Manufacturer1 Example=MURATA, Manufacturer1 Part Number=GRM21BF51C225ZA01L, Tolerance=±10%, Voltage=16V, Author="CERN DEM JLC", Component Type=Standard, CreateDate=3.12.2007, HelpURL=\\cern.ch\dfs\Applications\Altium\Datasheets\CC0805_X7R_MURATA_GRM.pdf, LatestRevisionDate=18.09.2014, Manufacturer Part Number=CC0805_2.2UF_16V_10%_X7R, Mounted=Yes, Part Description="SMD Multilayer Chip Ceramic Capacitor", Part Number=CC0805_2.2UF_16V_10%_X7R, Pin Count=2, Sense=No, SMD=Yes, Socket=No, Status=Preferred, TC=X7R
D1: "Schottky Diode", Case=DO-214AC, Manufacturer="VISHAY INTERTECHNOLOGY, INC.", Manufacturer Part Number=15MQ040N, Power=3A, Voltage=40V, Author="CERN DEM JLC", Bonding=No, Component Type=Standard, ComponentHeight=2.44mm, CreateDate=9.03.2009, Device=15MQ040NPbF, HelpURL=\\cern.ch\dfs\Applications\Altium\Datasheets\15MQ040NPbF.pdf, LatestRevisionDate=9.06.2022, Mounted=Yes, PackageDescription="DO-214-AC/SMA  Molded Diode, Body 5.0x2.7mm, IPC Medium Density", Part Description="Schottky Rectifier", Part Number=15MQ040NPbF, Pin Count=2, PressFit=No, Sense=No, SMD=Yes, Socket=No, Status=Obsolete
D2: "Schottky Diode", Case=SOD-323, Manufacturer="NXP SEMICONDUCTORS", Power=200mA, Voltage=30V, Author="CERN DEM JLC", Bonding=No, Component Type=Standard, ComponentHeight=1.1mm, CreateDate=6.12.2012, Device=1PS76SB10, HelpURL=\\cern.ch\dfs\Applications\Altium\Datasheets\1PS76SB10.pdf, LatestRevisionDate=6.12.2012, Manufacturer Part Number=1PS76SB10, Mounted=Yes, PackageDescription="Small Outline Diode (SOD-323), 1.70mm W X 1.25mm L X 1.10mm H body,  IPC Medium Density", Part Description="Schottky Barrier Single Diode", Part Number=1PS76SB10, Pin Count=2, PressFit=No, Sense=No, SMD=Yes, Socket=No
D3: library part 150060BS75020, "WL-SMCW Mono-color Chip LED Waterclear, size 0603, Blue, 3.2V, 140°", Case/Size Code=0603, Emitting Color=Blue, Forward Voltage=3.2V, Manufacturer="Wurth Elektronik", Operating Temperature Max=85°C, Operating Temperature Min=-40°C, Category="Signal LEDs", Chip Technology=InGaN, ComponentLink1Description="Website Link", ComponentLink1URL=https://www.we-online.com/redexpert/article/150060BS75020?ad, ComponentLink2Description="Datasheet Link", ComponentLink2URL=https://www.we-online.com/redexpert/spec/150060BS75020?ad, Dominant Wavelength=470nm, Height=0.25mm, Length=1.6mm, Luminous Intensity=150mcd, Manufacturer Part Number=150060BS75020, Match Code=WL-SMCW, Mount="Surface Mount", Packaging="Tape and Reel", Peak Wavelength=465nm, Viewing Angle=140°, Width=0.8mm
D5: library part 150060RS75003, "WL-SMCW Mono-color Chip LED Waterclear, size 0603, Red, 2V, 140°", Case/Size Code=0603, Emitting Color=Red, Forward Voltage=2V, Manufacturer="Wurth Elektronik", Operating Temperature Max=100°C, Operating Temperature Min=-40°C, Category="Signal LEDs", Chip Technology=AlInGaP, ComponentLink1Description="Website Link", ComponentLink1URL=https://www.we-online.com/redexpert/article/150060RS75003?ad, ComponentLink2Description="Datasheet Link", ComponentLink2URL=https://www.we-online.com/redexpert/spec/150060RS75003?ad, Dominant Wavelength=625nm, Height=0.7mm, Length=1.6mm, Luminous Intensity=530mcd, Manufacturer Part Number=150060RS75003, Match Code=WL-SMCW, Mount="Surface Mount", Packaging="Tape and Reel", Peak Wavelength=630nm, Viewing Angle=140°, Width=0.8mm
D6: library part 150060VS55040, "WL-SMCD Mono-color Chip LED Diffused, SMT, size 0603, Bright Green, 2V, 140°", Case/Size Code=0603, Emitting Color="Bright Green", Forward Voltage=2V, Manufacturer="Wurth Elektronik", Operating Temperature Max=85°C, Operating Temperature Min=-40°C, Category="Signal LEDs", Chip Technology=AlInGaP, ComponentLink1Description="Website Link", ComponentLink1URL=https://www.we-online.com/redexpert/article/150060VS55040?ad, ComponentLink2Description="Datasheet Link", ComponentLink2URL=https://www.we-online.com/redexpert/spec/150060VS55040?ad, Dominant Wavelength=573nm, Height=0.4mm, Length=1.6mm, Luminous Intensity=60mcd, Manufacturer Part Number=150060VS55040, Match Code=WL-SMCD, Mount="Surface Mount", Packaging="Tape and Reel", Peak Wavelength=575nm, Viewing Angle=140°, Width=0.8mm
D8: library part 150060YS55040, "WL-SMCD Mono-color Chip LED Diffused, SMT, size 0603, Yellow, 2V, 140°", Case/Size Code=0603, Emitting Color=Yellow, Forward Voltage=2V, Manufacturer="Wurth Elektronik", Operating Temperature Max=85°C, Operating Temperature Min=-40°C, Category="Signal LEDs", Chip Technology=AlInGaP, ComponentLink1Description="Website Link", ComponentLink1URL=https://www.we-online.com/redexpert/article/150060YS55040?ad, ComponentLink2Description="Datasheet Link", ComponentLink2URL=https://www.we-online.com/redexpert/spec/150060YS55040?ad, Dominant Wavelength=589nm, Height=0.4mm, Length=1.6mm, Luminous Intensity=100mcd, Manufacturer Part Number=150060YS55040, Match Code=WL-SMCD, Mount="Surface Mount", Packaging="Tape and Reel", Peak Wavelength=591nm, Viewing Angle=140°, Width=0.8mm
F1: library part FUS0603_BOURNS-SF-0603F050-2, "Fuse", Case=0603, Manufacturer=BOURNS, Manufacturer Part Number=SF-0603F050-2, Author="CERN DEM JLC", Component Type=Standard, ComponentHeight=0.55mm, CreateDate=1.02.2017, Family=Fuse, HelpURL=\\cern.ch\dfs\Applications\Altium\Datasheets\FUSC_BOURNS_SF-0603F.pdf, LatestRevisionDate=1.02.2017, Mounted=Yes, PackageDescription="Chip Fuse, 2-Leads, Body 1.6mm x 0.8mm, IPC Medium Density", Part Description="Fast Acting Thin Film Chip Fuse for Overcurrent Protection, SinglFuse™ SF-0603F  Series", Part Number=FUS0603_BOURNS-SF-0603F050-2, Pin Count=2, PressFit=No, Sense=No, SMD=Yes, Socket=No
GPS I2C3 TELEMETRY UART5: "WR-TBL Series 322 Horizontal PCB Header, THT, pitch 3.81mm, 4p", Manufacturer="Wurth Elektronik", Operating Temperature Max=105°C, Operating Temperature Min=-40°C, Rated Current=10A, Working Voltage=300V, Application=Pluggable, Category="Terminal Blocks", ComponentLink1Description="Website Link", ComponentLink1URL=https://www.we-online.com/redexpert/article/691322310004?ad, ComponentLink2Description="Datasheet Link", ComponentLink2URL=https://www.we-online.com/redexpert/spec/691322310004?ad, Manufacturer Part Number=691322310004, Match Code=WR-TBL, Modularity=No, Mount="Through Hole", Number of Pins=4, Number of Rows=1, Orientation=Horizontal, Packaging=Box, Pitch=3.81mm
IC1: "ARM Cortex-M4 32-bit MCU+FPU, 210DMIPS, 1024kB Flash, 192kB+4kB RAM, 51 I/Os, 64-pin LQFP, Industrial Grade –40 to 85°C", Case=QFP64, Manufacturer="ST MICROELECTRONICS", Author="CERN DEM JLC", Bonding=No, Component Type=Standard, ComponentHeight=1.6mm, CreateDate=20.06.2017, Device=STM32F405RGT6, HelpURL=\\cern.ch\dfs\Applications\Altium\Datasheets\STM32F405RGT6.pdf, LatestRevisionDate=20.06.2017, Manufacturer Part Number=STM32F405RGT6, Mounted=Yes, PackageDescription="QFP, 0.50mm Pitch, Square; 64 Pin, 10.0mm L X 10.0mm W X 1.60mm H body, IPC Medium Density", Part Description="ARM Cortex-M4 32-bit MCU+FPU, 210DMIPS, 1024KB Flash, 192+4 KB RAM, 51 I/Os, 64-pin LQFP, Industrial Grade –40 to 85°C", Part Number=STM32F405RGT6, Pin Count=64, PressFit=No, Sense=No, SMD=Yes, Socket=No
L1: library part 744771115, "WE-PD SMT Power Inductor, size 1260, 15uH, 4.2A, 28mOhm", Case/Size Code=1260, DC Resistance=22mOhm, DC Resistance Max=28mOhm, Manufacturer="Wurth Elektronik", Operating Temperature Max=125°C, Operating Temperature Min=-40°C, Rated Current=4.2A, Saturation Current=4.5A, Self Resonant Frequency=16.6MHz, Inductance=15uH, Category="Power Inductors", ComponentLink1Description="Website Link", ComponentLink1URL=https://www.we-online.com/redexpert/article/744771115?ad, ComponentLink2Description="Datasheet Link", ComponentLink2URL=https://www.we-online.com/redexpert/spec/744771115?ad, Height=6mm, Length=12mm, Manufacturer Part Number=744771115, Match Code=WE-PD, Mount="Surface Mount", Packaging="Tape and Reel", Type=Standard, Width=12mm
L2: library part IND0603_MURATA_BLM18BA100SN1D, Case=0603, Manufacturer=MURATA, Manufacturer Part Number=BLM18BA100SN1D, Power=500mA, Resistance=0.25R, Tolerance=±25%, Author="CERN DEM JLC", Component Type=Standard, ComponentHeight=0.95mm, CreateDate=13.01.2014, HelpURL=\\cern.ch\dfs\Applications\Altium\Datasheets\IND0603_MURATA_BLM18B.pdf, LatestRevisionDate=25.10.2018, Mounted=Yes, Part Description="SMD EMIFIL Suppression Chip Ferrite Bead", Part Number=IND0603_MURATA_BLM18BA100SN1D, Pin Count=2, Sense=No, SMD=Yes, Socket=No
L3: library part IND_10UH_10%_MURATA-PS_8200, "Inductor With Core", Manufacturer="MURATA POWER SOLUTIONS", Manufacturer Part Number=82103C, Power=500mA, Resistance=0.4R, Tolerance=±10%, Author="CERN DEM JLC", Component Type=Standard, ComponentHeight=2.3mm, CreateDate=21.07.2014, HelpURL=\\cern.ch\dfs\Applications\Altium\Datasheets\IND_MURATA-PS_8200.pdf, LatestRevisionDate=21.07.2014, Mounted=Yes, Part Description="Miniature Surface Mount Power Inductor (8200 Series)", Part Number=IND_10UH_10%_MURATA-PS_8200, Pin Count=2, Sense=No, SMD=Yes, Socket=No
P3: "WR-PHD Pin Header, THT, Vertical, pitch 2.54mm, 2 Row, 6P", Contact Resistance=20mOhm, Manufacturer="Wurth Elektronik", Operating Temperature Max=105°C, Operating Temperature Min=-40°C, Rated Current=3A, Withstanding Voltage=500V, Working Voltage=250V, Category="Board-to-Board Connectors", ComponentLink1Description="Website Link", ComponentLink1URL=https://www.we-online.com/redexpert/article/61300621121?ad, ComponentLink2Description="Datasheet Link", ComponentLink2URL=https://www.we-online.com/redexpert/spec/61300621121?ad, Gender="Pin Header", Manufacturer Part Number=61300621121, Match Code=WR-PHD, Mount="Through Hole", Number of Pins=6, Number of Rows=2, Orientation=Vertical, Packaging=Bag, Pitch=2.54mm
PROGRAMMING: "WR-PHD Pin Header, THT, Vertical, pitch 2.54mm, 1 Row, 5P", Contact Resistance=20mOhm, Manufacturer="Wurth Elektronik", Operating Temperature Max=105°C, Operating Temperature Min=-40°C, Rated Current=3A, Withstanding Voltage=500V, Working Voltage=250V, Category="Board-to-Board Connectors", ComponentLink1Description="Website Link", ComponentLink1URL=https://www.we-online.com/redexpert/article/61300511121?ad, ComponentLink2Description="Datasheet Link", ComponentLink2URL=https://www.we-online.com/redexpert/spec/61300511121?ad, Gender="Pin Header", Manufacturer Part Number=61300511121, Match Code=WR-PHD, Mount="Through Hole", Number of Pins=5, Number of Rows=1, Orientation=Vertical, Packaging=Bag, Pitch=2.54mm
"PWR LED": library part 158301227, "WL-SWTP SMT White Top view PLCC, size 3014, Sunrise, 3V, 120°", Case/Size Code=3014, Color Rendering Index=85, Correlated Color Temperature=2700K, Emitting Color=Sunrise, Forward Voltage=3V, Manufacturer="Wurth Elektronik", Operating Temperature Max=85°C, Operating Temperature Min=-40°C, Category="General Lighting", Chip Technology=InGaN, ComponentLink1Description="Website Link", ComponentLink1URL=https://www.we-online.com/redexpert/article/158301227?ad, ComponentLink2Description="Datasheet Link", ComponentLink2URL=https://www.we-online.com/redexpert/spec/158301227?ad, Height=0.8mm, Length=3mm, Luminous Flux=8lm, Manufacturer Part Number=158301227, Match Code=WL-SWTP, Mount="Surface Mount", Packaging="Tape and Reel", Viewing Angle=120°, Width=1.4mm
R1: library part R0805_40K2_0.1%_0.125W_15PPM, "Resistor - 0.1%", Case=0805, Manufacturer=GENERIC, Manufacturer1 ComponentHeight=0.65mm, Manufacturer1 Example="TYCO ELECTRONICS", Manufacturer1 Part Number=RP73D2A40K2BTG, Power=0.125W, Tolerance=±0.1%, Author="CERN DEM JLC", Component Type=Standard, CreateDate=5.03.2015, HelpURL=\\cern.ch\dfs\Applications\Altium\Datasheets\R0805_TYCO_RP73.pdf, LatestRevisionDate=28.06.2022, Manufacturer Part Number=R0805_40K2_0.1%_0.125W_15PPM, Mounted=Yes, Part Description="Thin Film Chip Resistor", Part Number=R0805_40K2_0.1%_0.125W_15PPM, Pin Count=2, PressFit=No, Sense=No, SMD=Yes, Socket=No, Status="Not Recommended", TC=±15ppm/°C
R2 R3: library part R0805_105K_0.1%_0.1W_10PPM, "Resistor - 0.1%", Case=0805, Manufacturer=GENERIC, Manufacturer1 ComponentHeight=0.6mm, Manufacturer1 Example="TYCO HOLSWORTHY", Manufacturer1 Part Number=RN73C2A105KBTG, Power=0.1W, Tolerance=±0.1%, Author="CERN DEM JLC", Component Type=Standard, CreateDate=3.12.2007, HelpURL=\\cern.ch\dfs\Applications\Altium\Datasheets\R0805_Tyco_RN73.pdf, LatestRevisionDate=13.03.2008, Manufacturer Part Number=R0805_105K_0.1%_0.1W_10PPM, Mounted=Yes, Part Description="Thin Film Chip Resistor", Part Number=R0805_105K_0.1%_0.1W_10PPM, Pin Count=2, PressFit=No, Sense=No, SMD=Yes, Socket=No, Status="Not Recommended", TC=±10ppm
R4 R7 R9: library part R0805_100K_1%_0.125W_100PPM, "Resistor - 1%", Case=0805, Manufacturer=GENERIC, Manufacturer1 ComponentHeight=0.6mm, Manufacturer1 Example="NIC COMPONENT", Manufacturer1 Part Number=NRC10F1003TRF, Power=0.125W, Tolerance=±1%, Author="CERN DEM JLC", Component Type=Standard, CreateDate=3.12.2007, HelpURL=\\cern.ch\dfs\Applications\Altium\Datasheets\R0805_NIC_NRC.pdf, LatestRevisionDate=13.03.2008, Manufacturer Part Number=R0805_100K_1%_0.125W_100PPM, Mounted=Yes, Part Description="General Purpose Thick Film Chip Resistor", Part Number=R0805_100K_1%_0.125W_100PPM, Pin Count=2, PressFit=No, Sense=No, SMD=Yes, Socket=No, Status=Preferred, TC=±100ppm/°C
R5 R6: library part R0805_5K1_1%_0.125W_100PPM, "Resistor - 1%", Case=0805, Manufacturer=GENERIC, Manufacturer1 ComponentHeight=0.6mm, Manufacturer1 Example="NIC COMPONENT", Manufacturer1 Part Number=NRC10F5101TRF, Power=0.125W, Tolerance=±1%, Author="CERN DEM JLC", Component Type=Standard, CreateDate=3.12.2007, HelpURL=\\cern.ch\dfs\Applications\Altium\Datasheets\R0805_NIC_NRC.pdf, LatestRevisionDate=13.03.2008, Manufacturer Part Number=R0805_5K1_1%_0.125W_100PPM, Mounted=Yes, Part Description="General Purpose Thick Film Chip Resistor", Part Number=R0805_5K1_1%_0.125W_100PPM, Pin Count=2, PressFit=No, Sense=No, SMD=Yes, Socket=No, Status=Preferred, TC=±100ppm/°C
R8: library part R0805_24K9_0.1%_0.1W_10PPM, "Resistor - 0.1%", Case=0805, Manufacturer=GENERIC, Manufacturer1 ComponentHeight=0.6mm, Manufacturer1 Example="TYCO HOLSWORTHY", Manufacturer1 Part Number=RN73C2A24K9BTG, Power=0.1W, Tolerance=±0.1%, Author="CERN DEM JLC", Component Type=Standard, CreateDate=3.12.2007, HelpURL=\\cern.ch\dfs\Applications\Altium\Datasheets\R0805_Tyco_RN73.pdf, LatestRevisionDate=13.03.2008, Manufacturer Part Number=R0805_24K9_0.1%_0.1W_10PPM, Mounted=Yes, Part Description="Thin Film Chip Resistor", Part Number=R0805_24K9_0.1%_0.1W_10PPM, Pin Count=2, PressFit=No, Sense=No, SMD=Yes, Socket=No, Status="Not Recommended", TC=±10ppm
R10 R11: library part R0805_22R_1%_0.125W_100PPM, "Resistor - 1%", Case=0805, Manufacturer=GENERIC, Manufacturer1 ComponentHeight=0.6mm, Manufacturer1 Example="NIC COMPONENT", Manufacturer1 Part Number=NRC10F22R0TRF, Power=0.125W, Tolerance=±1%, Author="CERN DEM JLC", Component Type=Standard, CreateDate=3.12.2007, HelpURL=\\cern.ch\dfs\Applications\Altium\Datasheets\R0805_NIC_NRC.pdf, LatestRevisionDate=13.03.2008, Manufacturer Part Number=R0805_22R_1%_0.125W_100PPM, Mounted=Yes, Part Description="General Purpose Thick Film Chip Resistor", Part Number=R0805_22R_1%_0.125W_100PPM, Pin Count=2, PressFit=No, Sense=No, SMD=Yes, Socket=No, Status=Preferred, TC=±100ppm/°C
R12 R14 R19 R20 R21 R22: library part R0805_1K_0.1%_0.125W_25PPM, "Resistor - 0.1%", Case=0805, Manufacturer=GENERIC, Manufacturer1 ComponentHeight=0.6mm, Manufacturer1 Example=PANASONIC, Manufacturer1 Part Number=ERA6AEB102V, Power=0.125W, Tolerance=±5%, Author="CERN DEM JLC", Component Type=Standard, CreateDate=18.10.2010, HelpURL=\\cern.ch\dfs\Applications\Altium\Datasheets\R0805_PANASONIC_ERA.pdf, LatestRevisionDate=18.10.2010, Manufacturer Part Number=R0805_1K_0.1%_0.125W_25PPM, Mounted=Yes, Part Description="Thin Film Chip Resistor", Part Number=R0805_1K_0.1%_0.125W_25PPM, Pin Count=2, PressFit=No, Sense=No, SMD=Yes, Socket=No, Status="Not Recommended", TC=±25ppm
R13 R16 R17: library part R0805_10K_0.1%_0.1W_10PPM, "Resistor - 0.1%", Case=0805, Manufacturer=GENERIC, Manufacturer1 ComponentHeight=0.6mm, Manufacturer1 Example="TYCO HOLSWORTHY", Manufacturer1 Part Number=RN73C2A10KBTG, Power=0.1W, Tolerance=±5%, Author="CERN DEM JLC", Component Type=Standard, CreateDate=3.12.2007, HelpURL=\\cern.ch\dfs\Applications\Altium\Datasheets\R0805_Tyco_RN73.pdf, LatestRevisionDate=13.03.2008, Manufacturer Part Number=R0805_10K_0.1%_0.1W_10PPM, Mounted=Yes, Part Description="Thin Film Chip Resistor", Part Number=R0805_10K_0.1%_0.1W_10PPM, Pin Count=2, PressFit=No, Sense=No, SMD=Yes, Socket=No, Status="Not Recommended", TC=±10ppm
R15: library part R0805_22K_1%_0.125W_100PPM, "Resistor - 1%", Case=0805, Manufacturer=GENERIC, Manufacturer1 ComponentHeight=0.6mm, Manufacturer1 Example="NIC COMPONENT", Manufacturer1 Part Number=NRC10F2202TRF, Power=0.125W, Tolerance=±5%, Author="CERN DEM JLC", Component Type=Standard, CreateDate=3.12.2007, HelpURL=\\cern.ch\dfs\Applications\Altium\Datasheets\R0805_NIC_NRC.pdf, LatestRevisionDate=13.03.2008, Manufacturer Part Number=R0805_22K_1%_0.125W_100PPM, Mounted=Yes, Part Description="General Purpose Thick Film Chip Resistor", Part Number=R0805_22K_1%_0.125W_100PPM, Pin Count=2, PressFit=No, Sense=No, SMD=Yes, Socket=No, Status=Preferred, TC=±100ppm/°C
R18: library part R0805_100K_1%_0.125W_100PPM, "Resistor - 1%", Case=0805, Manufacturer=GENERIC, Manufacturer1 ComponentHeight=0.6mm, Manufacturer1 Example="NIC COMPONENT", Manufacturer1 Part Number=NRC10F1003TRF, Power=0.125W, Tolerance=±5%, Author="CERN DEM JLC", Component Type=Standard, CreateDate=3.12.2007, HelpURL=\\cern.ch\dfs\Applications\Altium\Datasheets\R0805_NIC_NRC.pdf, LatestRevisionDate=13.03.2008, Manufacturer Part Number=R0805_100K_1%_0.125W_100PPM, Mounted=Yes, Part Description="General Purpose Thick Film Chip Resistor", Part Number=R0805_100K_1%_0.125W_100PPM, Pin Count=2, PressFit=No, Sense=No, SMD=Yes, Socket=No, Status=Preferred, TC=±100ppm/°C
R23 R24 R25 R26 R27 R28 R29 R30 R31: library part R0805_10K_0.1%_0.1W_10PPM, "Resistor - 0.1%", Case=0805, Manufacturer=GENERIC, Manufacturer1 ComponentHeight=0.6mm, Manufacturer1 Example="TYCO HOLSWORTHY", Manufacturer1 Part Number=RN73C2A10KBTG, Power=0.1W, Tolerance=±0.1%, Author="CERN DEM JLC", Component Type=Standard, CreateDate=3.12.2007, HelpURL=\\cern.ch\dfs\Applications\Altium\Datasheets\R0805_Tyco_RN73.pdf, LatestRevisionDate=13.03.2008, Manufacturer Part Number=R0805_10K_0.1%_0.1W_10PPM, Mounted=Yes, Part Description="Thin Film Chip Resistor", Part Number=R0805_10K_0.1%_0.1W_10PPM, Pin Count=2, PressFit=No, Sense=No, SMD=Yes, Socket=No, Status="Not Recommended", TC=±10ppm
RESET: library part PB_C&K_KSR223GLFG, "Push-Button Switch SPST", Manufacturer=C&K, Manufacturer Part Number=KSR223GLFG, Author="CERN DEM HF", Component Type=Standard, ComponentHeight=2.5mm, CreateDate=5.10.2021, Family="Push Button", HelpURL=\\cern.ch\dfs\Applications\Altium\Datasheets\PB_C&K_KSR-Series.pdf, LatestRevisionDate=5.10.2021, Mounted=Yes, PackageDescription="Body 7.3x3.8mm, Surface Mount Subminiature Tact Switch, C&K KSR Series", Part Description="32VDC 10mA SPST-NO Surface Mount Subminiature Tact Momentary Pushbutton Switch, Operating Force 2N", Part Number=PB_C&K_KSR223GLFG, Pin Count=2, PressFit=No, Sense=Yes, Sense Comment=Non-washable, SMD=Yes, Socket=No, Status=None
SCREW1 SCREW2 SCREW3 SCREW4: library part BOSSARD_BN5687-3061605_v, "Screw", Manufacturer=BOSSARD, Manufacturer Part Number="BN5687 Art.3061605", Author="CERN DEM JLC", Component Type=Mechanical, ComponentHeight=2.4mm, CreateDate=15.01.2013, HelpURL=\\cern.ch\dfs\Applications\Altium\Datasheets\BOSSARD_BN5687-3061605.pdf, LatestRevisionDate=15.01.2013, Mounted=Yes, PackageDescription="M3 L=6mm Hexalobular Socket Pan Head Screw, Fully Threaded - Stainless Steel A2", Part Description="M3 L=6mm Hexalobular Socket Pan Head Screw, Fully Threaded, Stainless Steel A2", Part Number=BOSSARD_BN5687-3061605_v, Pin Count=0, PressFit=No, Sense=No, SMD=No, Socket=No, Status=None
T1: "NPN Transistor + Exposed Pad", Manufacturer=MICROSEMI, Author="CERN DEM BC", Bonding=No, Component Type=Standard, ComponentHeight=1.42mm, CreateDate=28.05.2020, Device=2N2222AUB, HelpURL=\\cern.ch\dfs\Applications\Altium\Datasheets\2N2222AUB.pdf, LatestRevisionDate=28.05.2020, Manufacturer Part Number=2N2222AUB, Mounted=Yes, PackageDescription="MICROSEMI UB Case, 2.45mm L x 3.08mm W 1.42mm H body", Part Description="50V 800mA NPN Silicon Switching Transistor", Part Number=2N2222AUB, Pin Count=4, PressFit=No, Sense=No, SMD=Yes, Socket=No
TYPE-C: "WR-COM USB 2.0 Type C Receptacle Horizontal SMT", Manufacturer="Wurth Elektronik", Operating Temperature Max=85°C, Operating Temperature Min=-40°C, Rated Current=5A, Working Voltage="20V (DC)", Application="USB 2.0", Category="Input/Output Connectors", ComponentLink1Description="Website Link", ComponentLink1URL=https://www.we-online.com/redexpert/article/629722000214?ad, ComponentLink2Description="Datasheet Link", ComponentLink2URL=https://www.we-online.com/redexpert/spec/629722000214?ad, Gender=Receptacle, Manufacturer Part Number=629722000214, Match Code=WR-USB, Mount="Surface Mount", Number of Pins=16, Number of Ports=1, Orientation=Horizontal, Packaging="Tape and Reel", Interface Type="Type C"
U1: "MPU-9250 series Accelerometer, Gyroscope, Humidity, Magnetometer, Pressure, Temperature Sensor Evaluation Board", Package="TFQFN-24 TDK InvenSense", Check_prices=https://www.snapeda.com/parts/MPU-9250/TDK+InvenSense/view-part/?ref=eda, MF="TDK InvenSense", MP=MPU-9250, SnapEDA_Link=https://www.snapeda.com/parts/MPU-9250/TDK+InvenSense/view-part/?ref=snap
U2: "BMP280 Absolute Barometric Pressure Sensor for Battery Powered Devices 2 x 2.5mm", Package=None, Availability=Unavailable, MP=BMP280, Price=None
"VIN(5V-24V) ->": library part POWER_CONNECTOR_lion_batt

## Via types
v1: diameter 20, hole 10, Top Layer to Bottom Layer, tented both sides, 351 vias
v2: diameter 25, hole 15, Top Layer to Bottom Layer, tented both sides, 89 vias
v3: diameter 23.62, hole 13.78, Top Layer to Bottom Layer, tented both sides, 8 vias
v4: diameter 35, hole 25, Top Layer to Bottom Layer, tented both sides, 4 vias
v5: diameter 25, hole 15, Top Layer to LY_2, tented both sides, 1 vias
v6: diameter 30, hole 20, Top Layer to Bottom Layer, tented both sides, 1 vias

## Nets (pads, with @x,y where several pads share a name; then routed paths per layer and width w, separated by ;. In a path a pad name is that pad's centre, name@x,y a point inside that pad or via, vN(x,y) a via of type N, cw(c..) or ccw(c..) an arc to the next point about the centre after c; other vN are vias at no path point)
+3.3V_DC: *3.6 *4.5 *5.3 *5.7 *5.8 BOOT.1 C11.2 C12.2 C16.2 C17.2 C18.2 C19.2 C20.2 C21.2 C22.2 C29.2 C30.2 C31.2 C32.2 C33.2 GPS.1 I2C3.1 IC1.1 IC1.19 IC1.32 IC1.48 IC1.64 L3.1 PROGRAMMING.1 R10.1 R12.2 R13.2 R16.1 R24.2 R25.2 R27.1 R28.1 R30.2 R31.2 TELEMETRY.1 U1.1 U1.8 U1.13 U2.2 U2.6 U2.8 UART5.1 | length 15771.5
  Top Layer w8: C30.2@533.38,1700.2 U1.13@609.8,1700.2 ; U1.8@694.25,1721.65 694.58,1721.98 694.58,1735.26 711.05,1751.73 738.27,1751.73 v2(738.96,1751.04) ; U2.2@1458.5,1837.2 1461.39,1840.09 1472.55,1840.09 1492.45,1860 1518.7,1860 U2.6@1521.49,1862.8
  Top Layer w10: v2(738.96,1751.04) 738.96,1723.13 754.05,1708.04 754.05,1629.37 746.81,1622.13 732.12,1622.13 U1.1@731.45,1621.46 731.45,1599.76 772.35,1558.86 853.58,1558.86 IC1.64@854.49,1557.95 902.96,1557.95 v2@917.03,1543.89 ; v2(920,1540) 920,1536.97 931.26,1525.71 IC1.1@931.26,1481.18 ; v2(920,1860) 920,1863.69 931.26,1874.95 931.26,1968.74 900,2000 825.86,2000 820,2005.86 820,2050 845.67,2075.67 1025.67,2075.67 1040,2090 R10.1@1040,2119.37 R10.1@1027.4,2131.97 ; R10.1@1047.4,2121.97 1050,2119.37 1220.12,2119.37 1380.63,1958.86 R25.2@1380.63,1950 ; v2(1221.52,1861.53) 1222.16,1861.53 1230.46,1853.23 IC1.32@1303.31,1853.23 ; IC1.19@1303.31,1597.32 1377.55,1597.32 1383.18,1591.69 1402.43,1591.69 1410.68,1599.94 1460.06,1599.94 1465.86,1594.14 1505.96,1594.14 1590,1678.18 v2(1590,1750) ; U2.2@1458.5,1837.2 1427.2,1837.2 1410,1820 1410,1801.26 R24.2@1400,1791.26 1483.05,1791.26 1503.41,1811.61 C32.2@1590,1811.61 ; C31.2@1676.89,1811.61 1685.27,1820 v3(1790,1820)